# Altium PCB Kame_FMU.PcbDoc (part 1 of 2)
Units mm, origin at the board's own origin, x right, y up, seen from the top; angles counter-clockwise.
Board outline 31 x 31 mm, 6 copper layers (Top, GND2, L3, L4, GND5, Bottom), stack 1.578 mm thick; 102 components, 158 nets, 567 pads, 386 vias.
Unrouted connection lines stored in the file: 87.
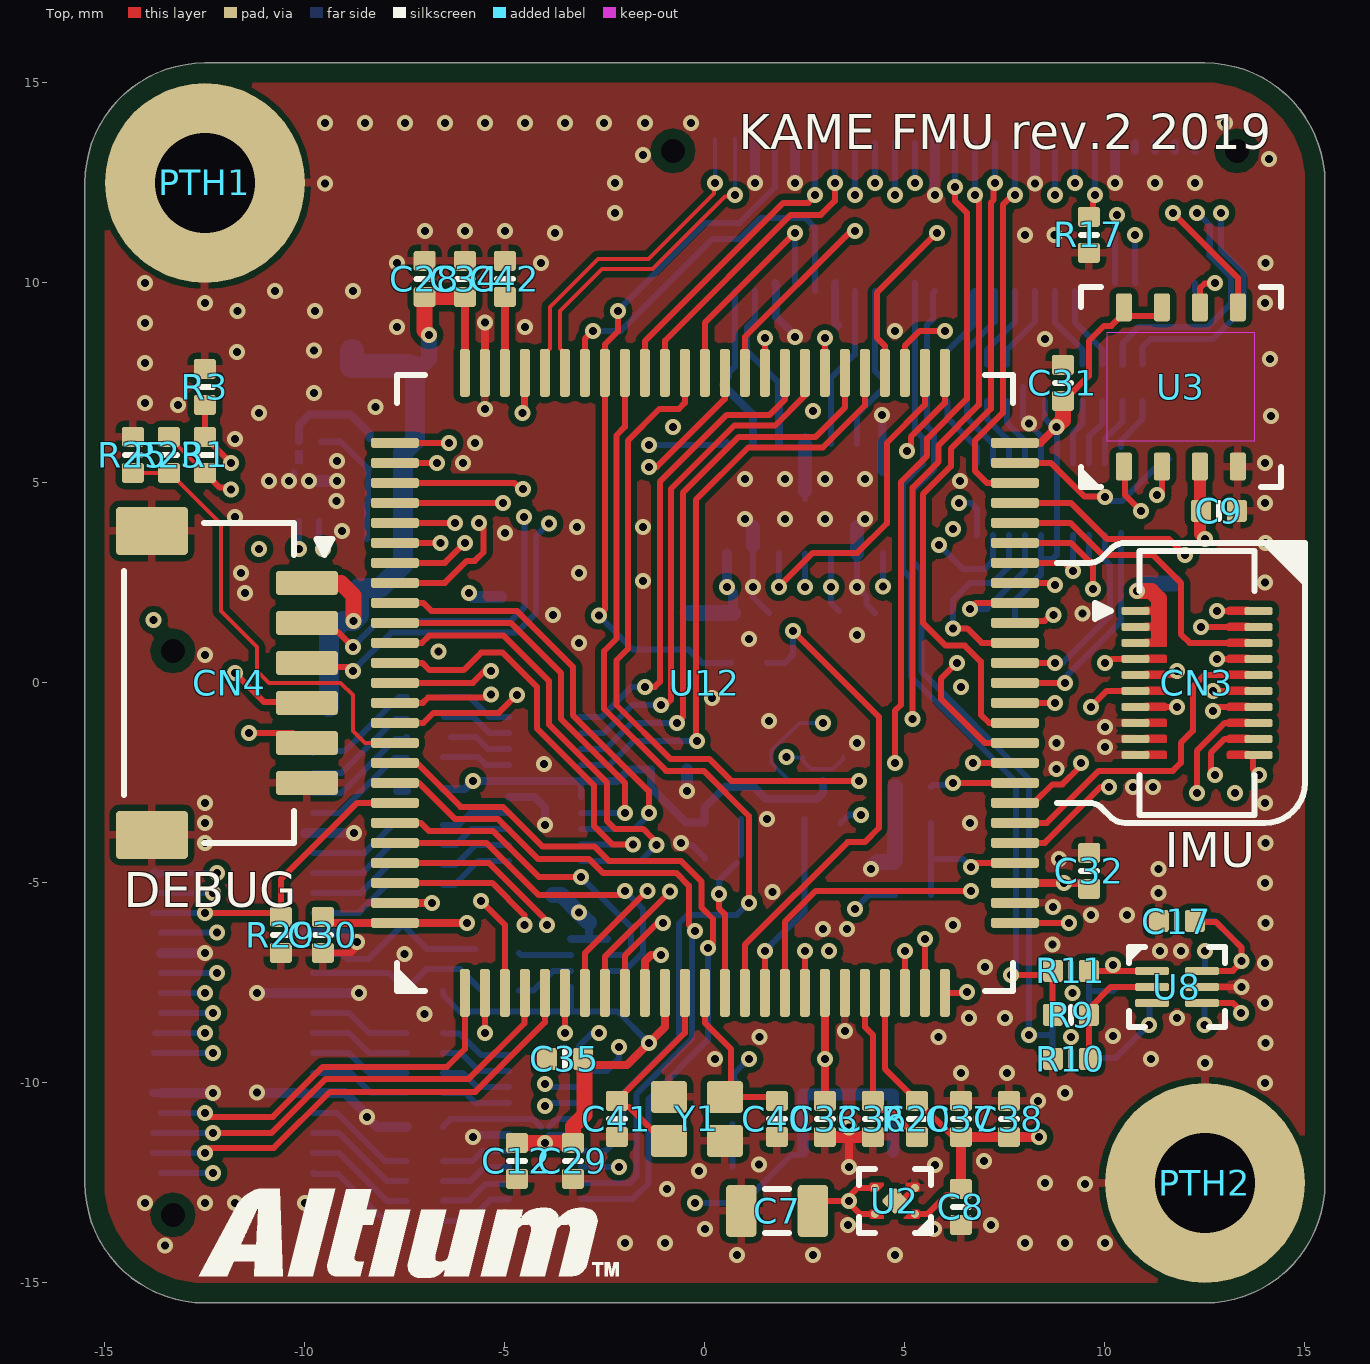
[diagram p0: Top view]
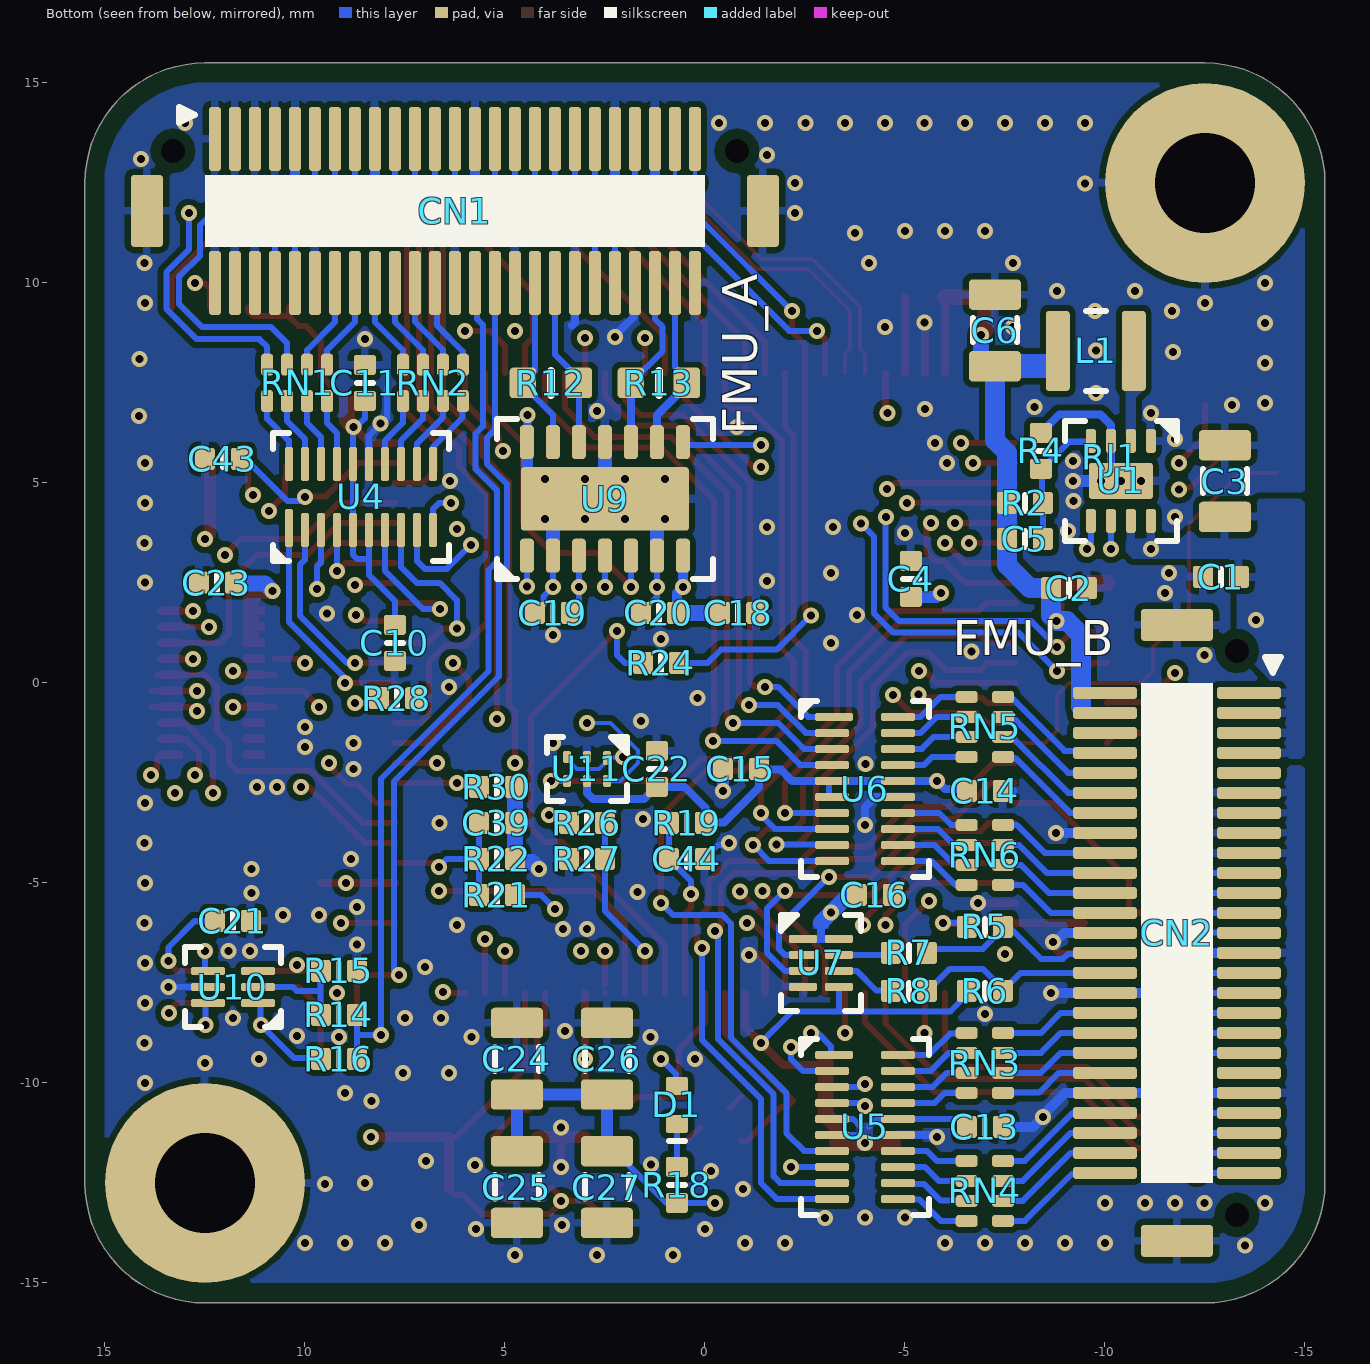
[diagram p1: Bottom view, seen from below]
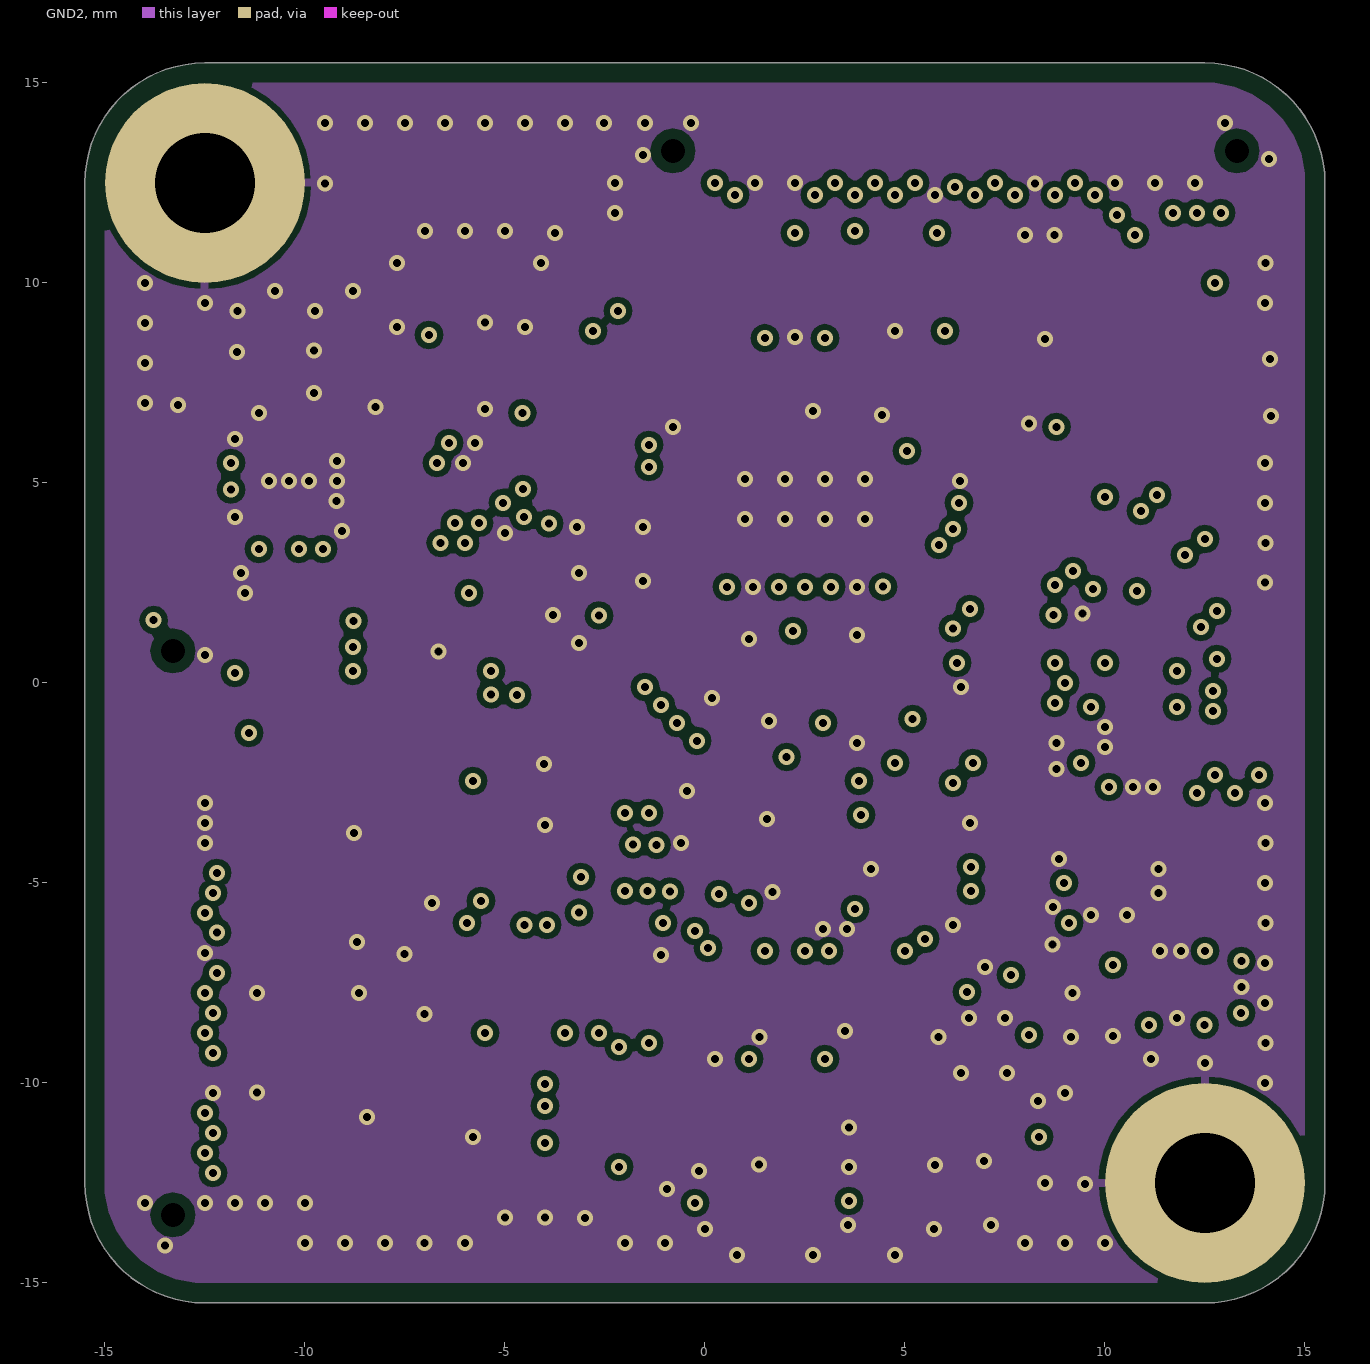
[diagram p2: GND2]
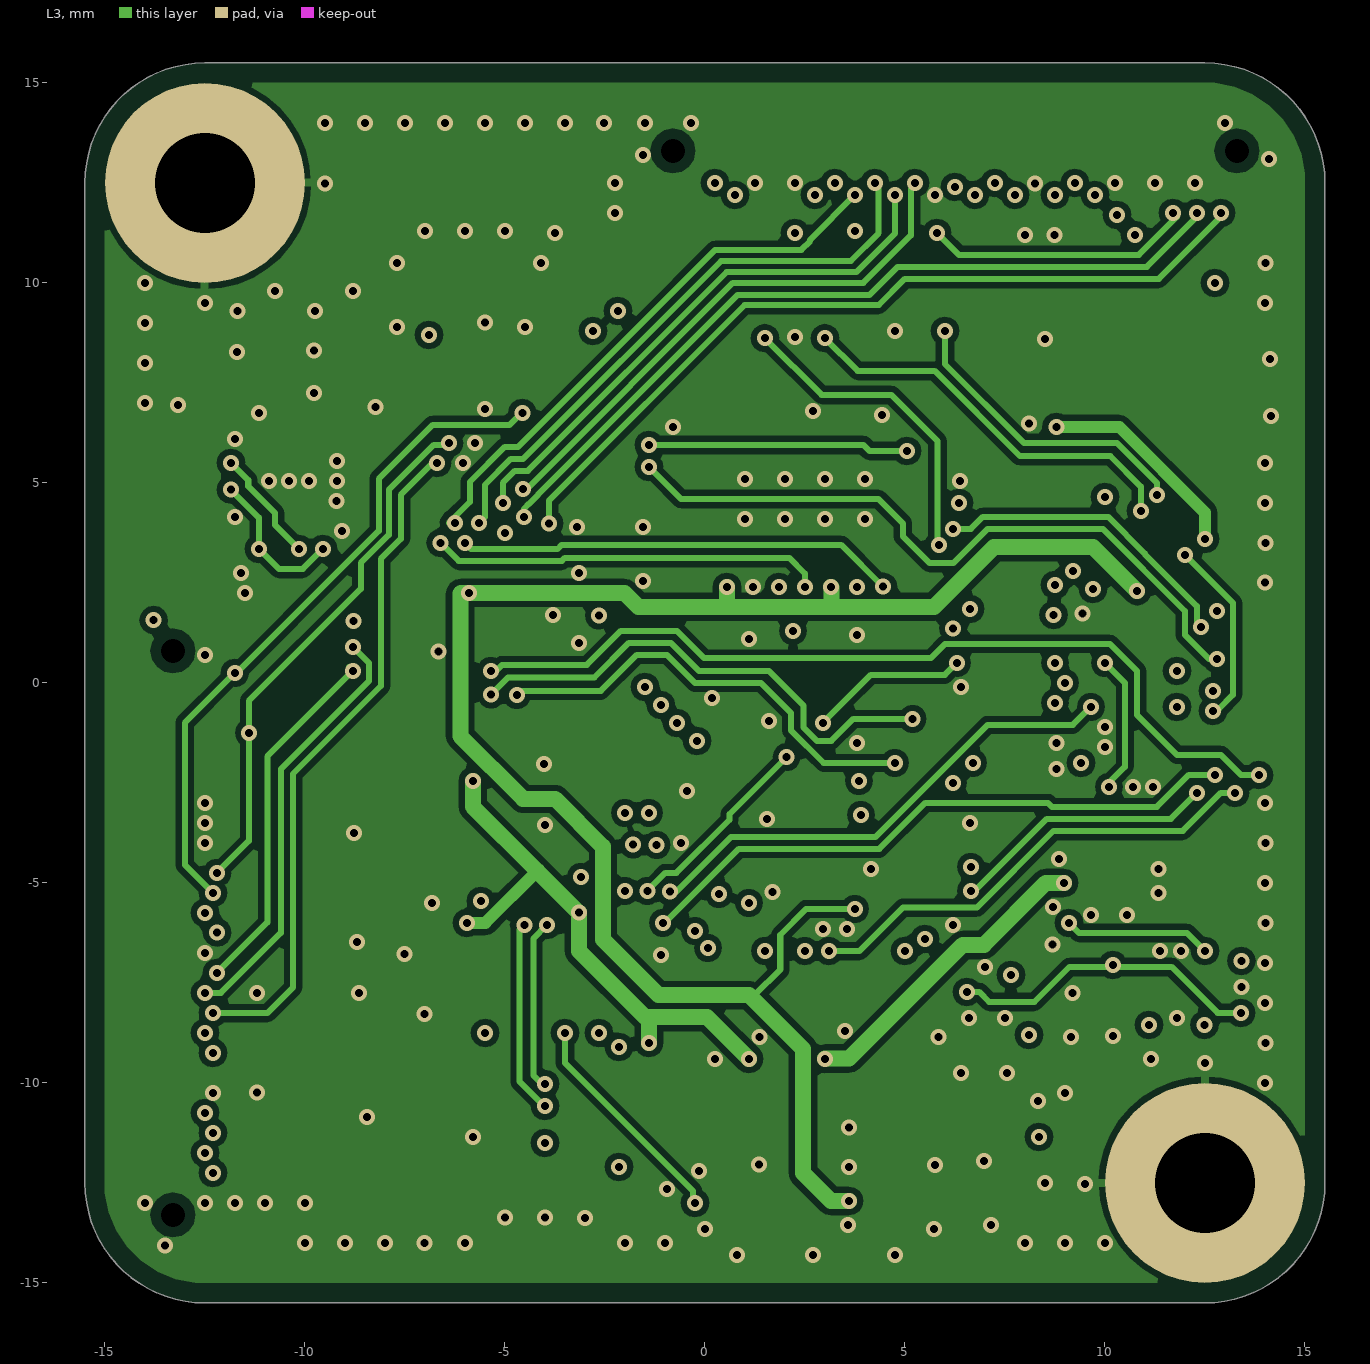
[diagram p3: L3]
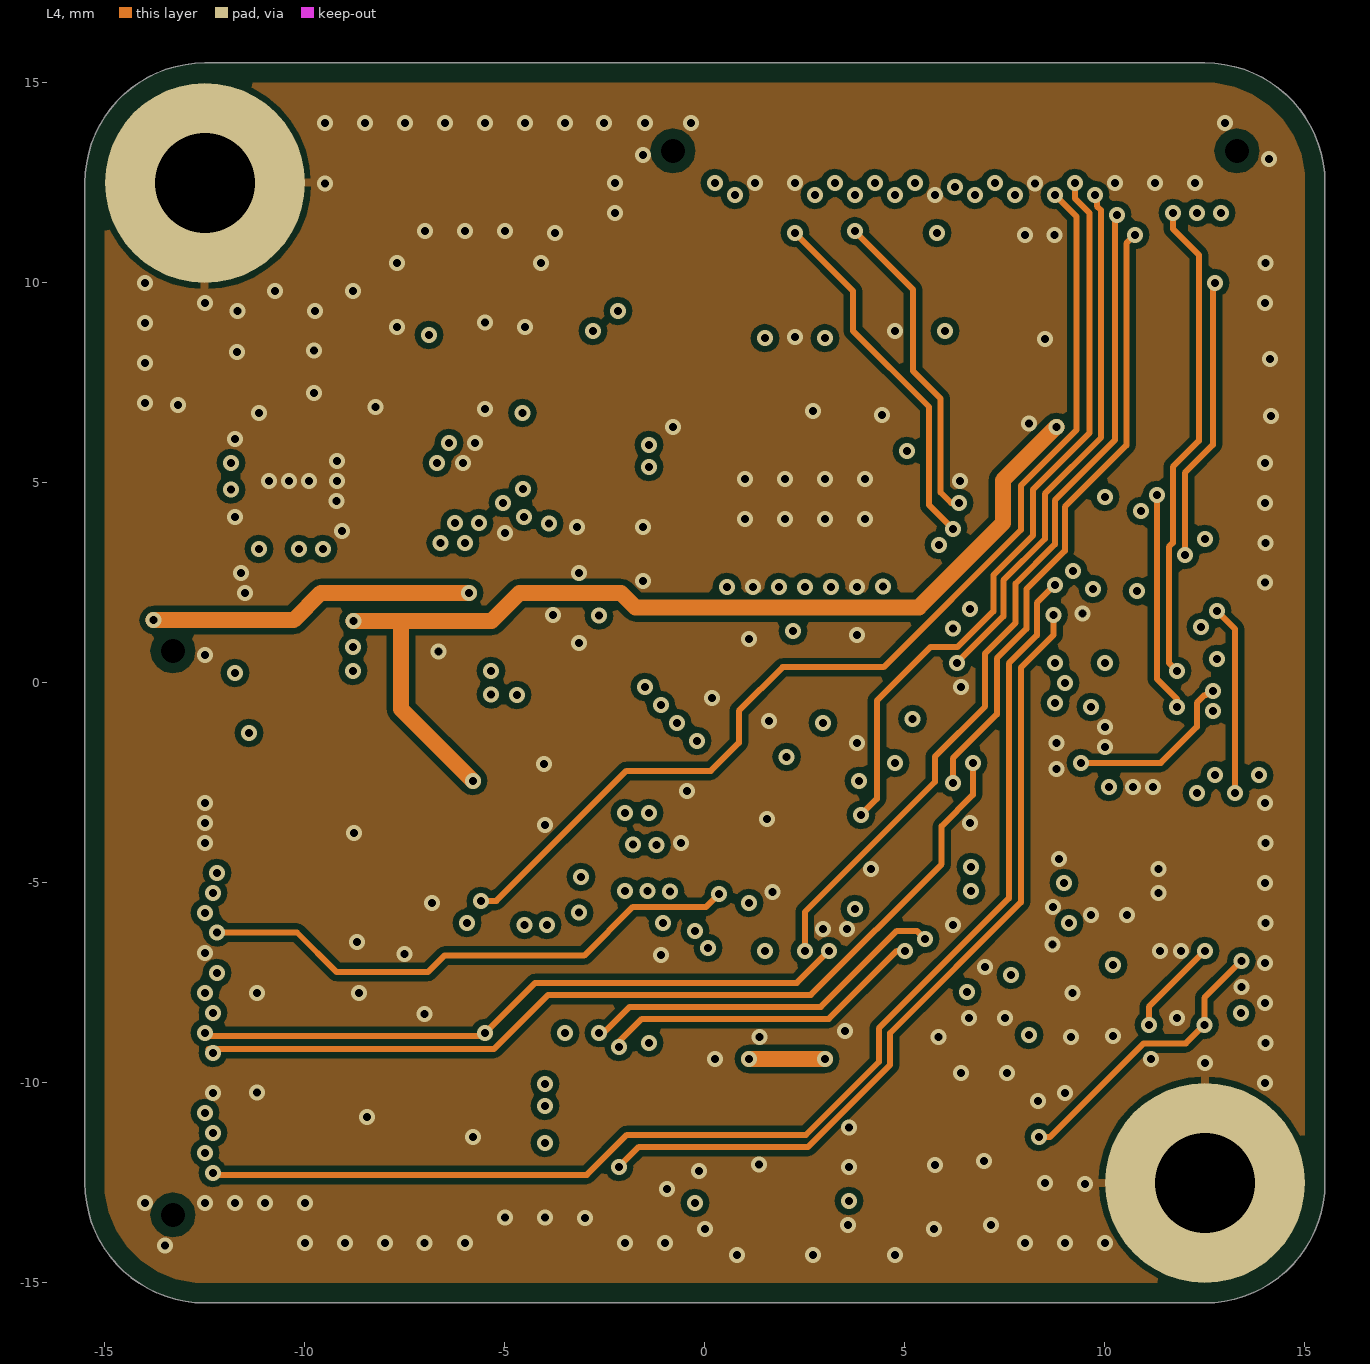
[diagram p4: L4]
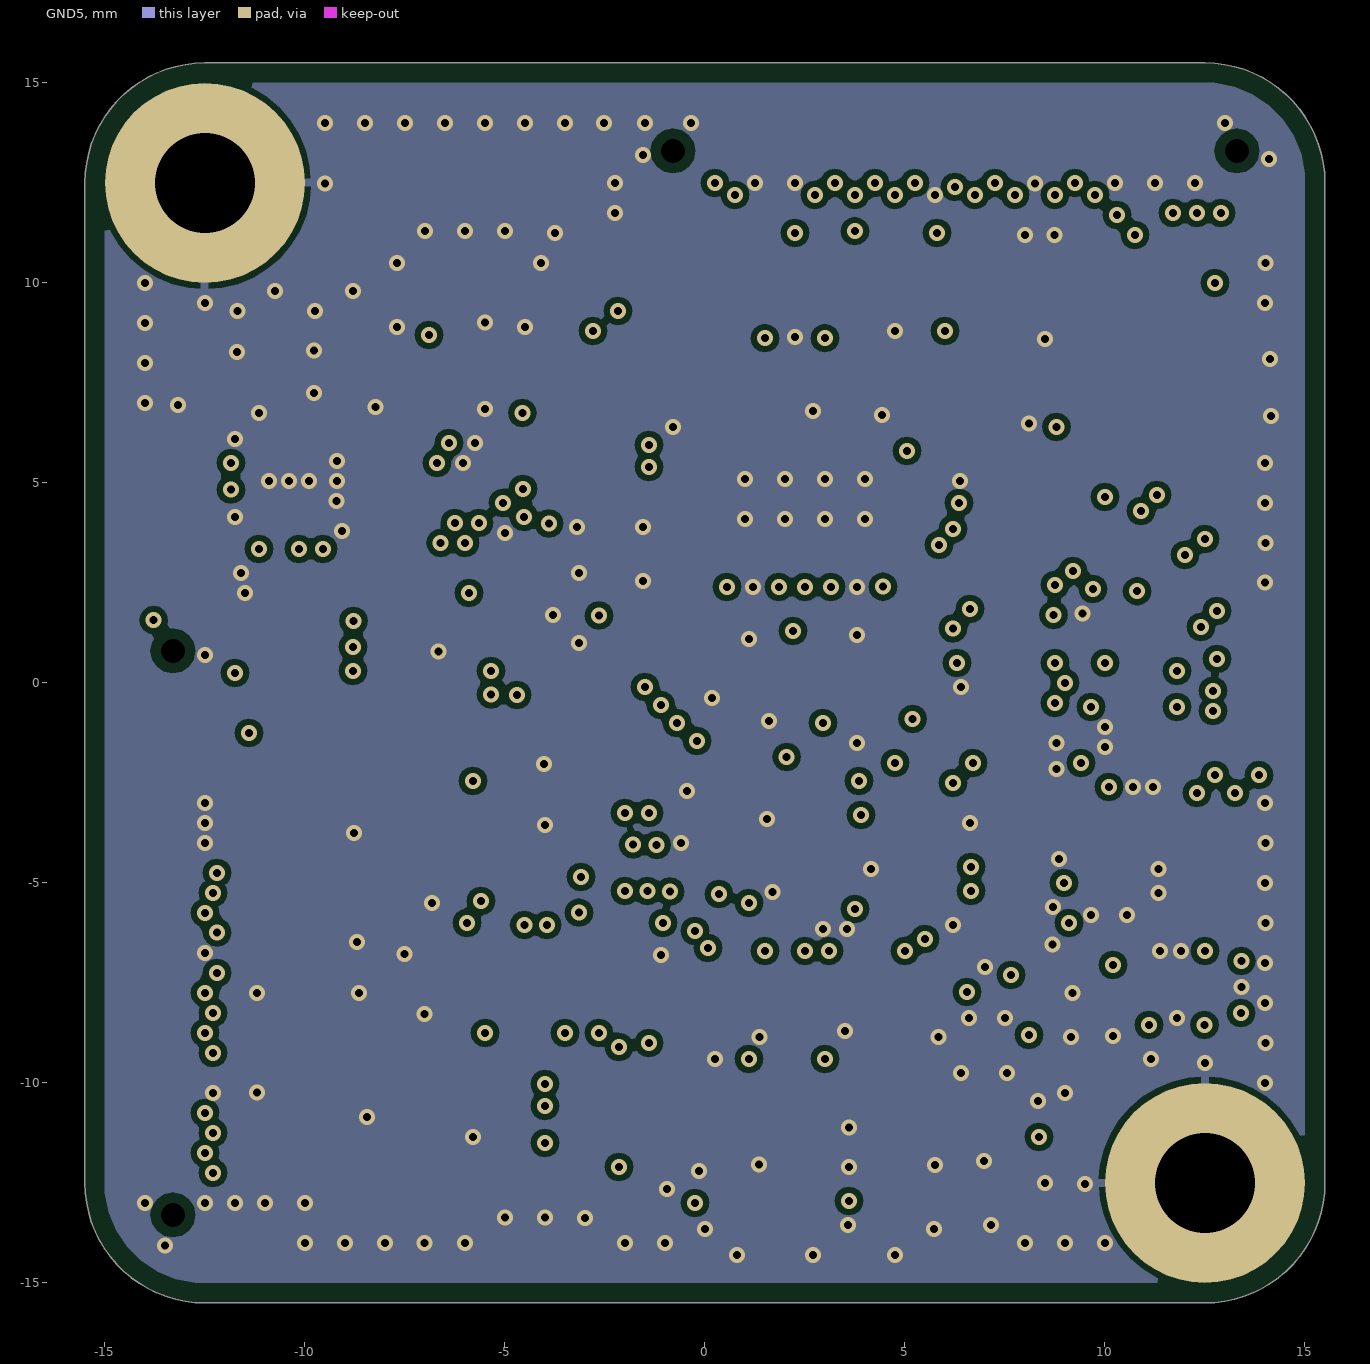
[diagram p5: GND5]
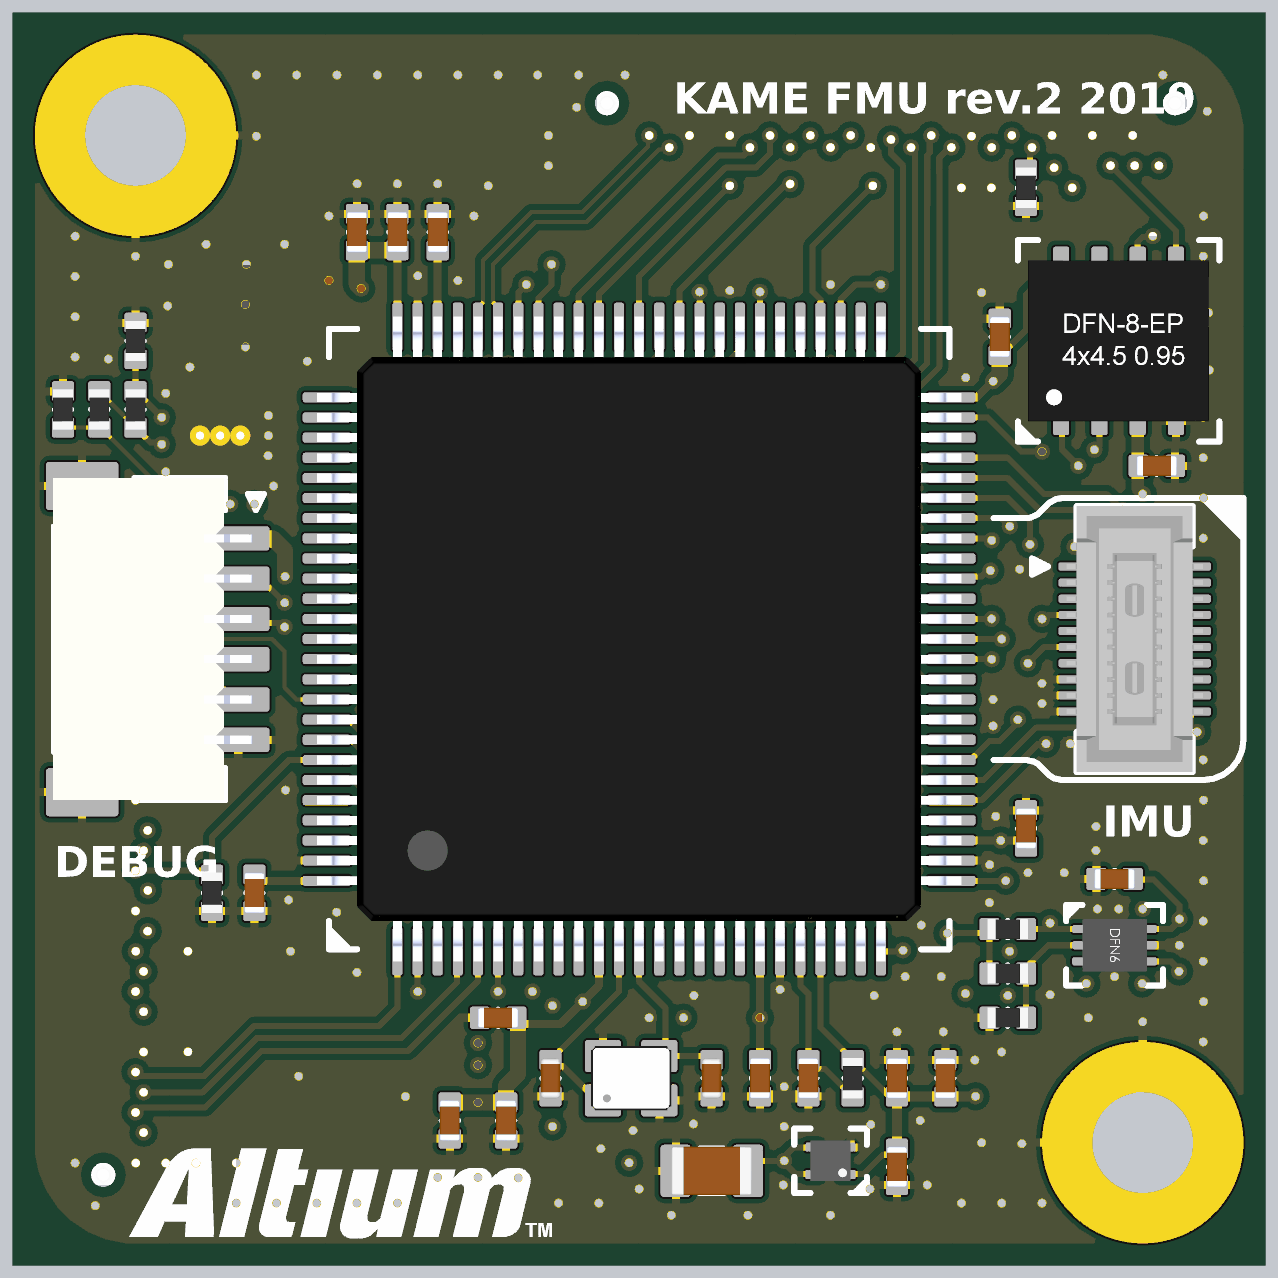
[diagram p7: 3D render of the assembled board from above, using the file's embedded part models]
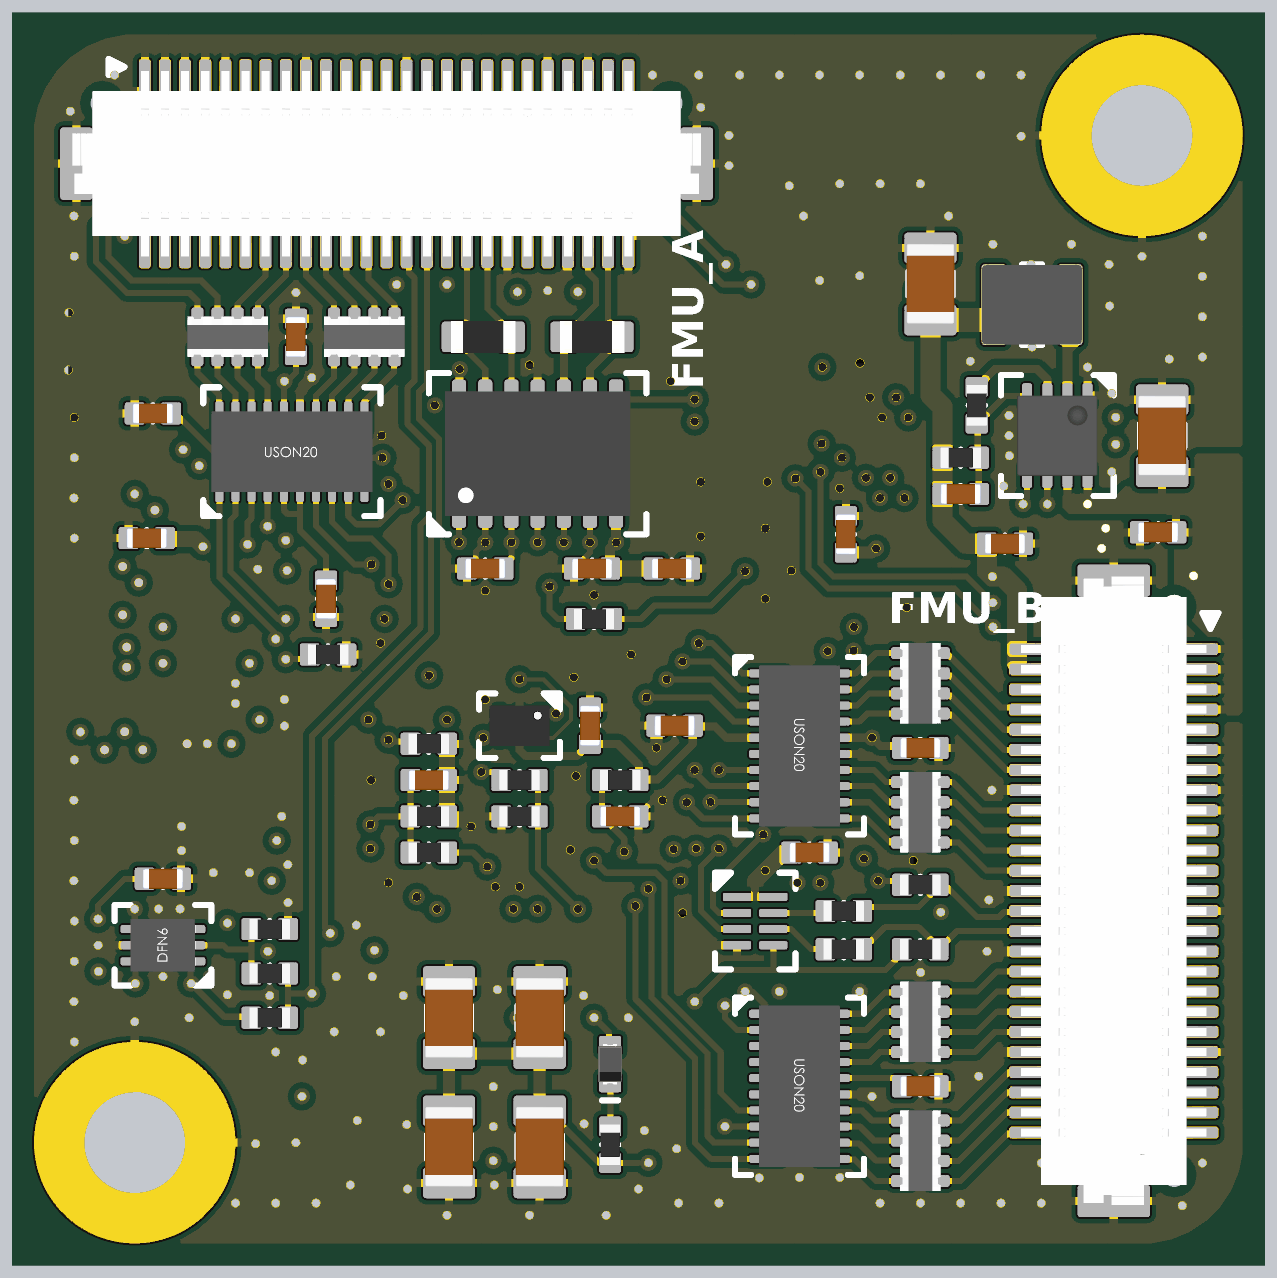
[diagram p8: 3D render of the assembled board from below, using the file's embedded part models]

## Layer stack, top to bottom
Top Solder: solder mask 0.0102, Solder Resist, Dk 3.5
Top: signal copper 0.018
Dielectric 6: prepreg 0.15, PP-006, Dk 4.1
GND2: signal copper 0.018
Dielectric 5: core 0.51, Core-009, Dk 4.5
L3: signal copper 0.018
Dielectric 4: prepreg 0.15, PP-006, Dk 4.1
L4: signal copper 0.018
Dielectric 3: core 0.51, Core-009, Dk 4.5
GND5: signal copper 0.018
Dielectric 2: prepreg 0.15, PP-006, Dk 4.1
Bottom: signal copper 0.018
Bottom Solder: solder mask 0.0102, Solder Resist, Dk 3.5

## Board outline
12.5,-15.5 -12.5,-15.5 cw(c-12.5,-12.5) -15.5,-12.5 -15.5,12.5 cw(c-12.5,12.5) -12.5,15.5 12.5,15.5 cw(c12.5,12.5) 15.5,12.5 15.5,-12.5 cw(c12.5,-12.5)

## Design rules (kind name [scope] priority, off if disabled: settings)
BoardOutlineClearance [All] p1: gap=0.25 ignorepadtopadclearanceinfootprint=FALSE
Clearance "Outline/NPTH clearance" [(IsThruPin and (PadisPlated = 'False')) or IsBoardCutoutRegion or IsBoardOutline] p1: gap=0.25 ignorepadtopadclearanceinfootprint=FALSE
Clearance "Polygon clearance" [InPolygon] p2: gap=0.15 ignorepadtopadclearanceinfootprint=FALSE except(0.2: Arc-Hole Track-Hole SMDPad-Hole THPad-Hole Via-Hole Fill-Hole Poly-Hole Region-Hole Text-Hole)
Clearance "Default clearance" [All] p3: gap=0.1 ignorepadtopadclearanceinfootprint=FALSE
ComponentClearance [All] p1: gap=0.05 collisioncheckmode=3 verticalgap=0.1 showdistances=FALSE
DiffPairsRouting "Schematic Differential Pairs Routing_3" [InNet('USB_N')] p1: maxlimit=0.254 minlimit=0.1 mostfreqgap=0.15 toplayer_minwidth=0.1 toplayer_maxwidth=0.381 toplayer_prefwidth=0.15 midlayer1_minwidth=0.1 midlayer1_maxwidth=0.381 midlayer1_prefwidth=0.15 midlayer2_minwidth=0.1 midlayer2_maxwidth=0.381 midlayer2_prefwidth=0.15 midlayer3_minwidth=0.1 midlayer3_maxwidth=0.381 midlayer3_prefwidth=0.15 midlayer4_minwidth=0.1 midlayer4_maxwidth=0.381 midlayer4_prefwidth=0.15 bottomlayer_minwidth=0.1 bottomlayer_maxwidth=0.381 bottomlayer_prefwidth=0.15 maxuncoupledlength=12.7
DiffPairsRouting "Schematic Differential Pairs Routing_2" [InNet('USB_P')] p2: maxlimit=0.254 minlimit=0.1 mostfreqgap=0.15 toplayer_minwidth=0.1 toplayer_maxwidth=0.381 toplayer_prefwidth=0.1 midlayer1_minwidth=0.1 midlayer1_maxwidth=0.381 midlayer1_prefwidth=0.1 midlayer2_minwidth=0.1 midlayer2_maxwidth=0.381 midlayer2_prefwidth=0.1 midlayer3_minwidth=0.1 midlayer3_maxwidth=0.381 midlayer3_prefwidth=0.1 midlayer4_minwidth=0.1 midlayer4_maxwidth=0.381 midlayer4_prefwidth=0.1 bottomlayer_minwidth=0.1 bottomlayer_maxwidth=0.381 bottomlayer_prefwidth=0.1 maxuncoupledlength=12.7
DiffPairsRouting [InDifferentialPair('OTG_FS')] p3: maxlimit=0.15 minlimit=0.15 mostfreqgap=0.15 toplayer_minwidth=0.1 toplayer_maxwidth=0.1 toplayer_prefwidth=0.1 midlayer1_minwidth=0.1 midlayer1_maxwidth=0.1 midlayer1_prefwidth=0.1 midlayer2_minwidth=0.1 midlayer2_maxwidth=0.1 midlayer2_prefwidth=0.1 midlayer3_minwidth=0.1 midlayer3_maxwidth=0.1 midlayer3_prefwidth=0.1 midlayer4_minwidth=0.1 midlayer4_maxwidth=0.1 midlayer4_prefwidth=0.1 bottomlayer_minwidth=0.1 bottomlayer_maxwidth=0.1 bottomlayer_prefwidth=0.1 maxuncoupledlength=12.7
HoleSize [All] p1: absolutevalues=TRUE maxlimit=6 minlimit=0.2 maxpercent=80.000 minpercent=20.000
MinimumAnnularRing [All] p1: minimumring=0.1
MinimumSolderMaskSliver [All] p1: minsoldermaskwidth=0
PlaneConnect [All] p1: planeconnectstyle=Relief reliefexpansion=0.508 reliefentries=4 reliefconductorwidth=0.15 reliefairgap=0.15
PolygonConnect [IsPolygon vs InNet('GND') And IsVia] p1: connectstyle=Direct reliefconductorwidth=0.15 reliefentries=4 polygonreliefangle="90 Angle" airgapwidth=0.12
PolygonConnect PolygonConnect_1 [All] p2: connectstyle=Relief reliefconductorwidth=0.2 reliefentries=4 polygonreliefangle="90 Angle" airgapwidth=0.15
RoutingCorners [All] p1: cornerstyle=45-Degree minsetback=0.15 maxsetback=0.15
RoutingLayers [All] p1: top layer_v5=TRUE mid layer 1_v5=FALSE mid layer 2_v5=TRUE mid layer 3_v5=TRUE mid layer 4_v5=FALSE bottom layer_v5=TRUE
RoutingVias [All] p1: holewidth=0.2 width=0.4 viastyle="Through Hole" minholewidth=0.15 minwidth=0.35 maxholewidth=0.711 maxwidth=1.27
SilkToSolderMaskClearance [IsPad] p1: minsilkscreentomaskgap=0.1 clearancetoexposedcopper=TRUE
SolderMaskExpansion [All] p1: expansion=0.05 istentingtop=FALSE
Width [All] p1: maxlimit=1 minlimit=0.1 preferedwidth=0.15
22 further rules are at their usual default settings.

## Classes and differential pairs
component class 6_uart_esc_i2c: C10 C11 C12 C13 C14 C15 RN1 RN2 RN3 RN4 RN5 RN6 U4 U5 U6
component class 8_imu&debug_conn: C23 C46 CN3 CN4
component class 5_spi_memory: C9 U3
component class 2_mb_conn: C1 C2 CN1 CN2 PTH1 PTH2
component class 4_cpu: C24 C25 C26 C27 C28 C29 C30 C31 C32 C33 C34 C35 C36 C37 C38 C39 C40 C41 C42 C43 C44 C45 D1 R18 R19 R20 R21 R22 R23 R24 R25 R26 R27 R28 R29 R30 R31 U12 Y1
component class 3_power: C3 C4 C5 C6 C7 C8 L1 R1 R2 R3 R4 RJ1 U1 U2
component class 7_can_rc_i2c_analog: C16 C17 C18 C19 C20 C21 C22 R5 R6 R7 R8 R9 R10 R11 R12 R13 R14 R15 R16 R17 U7 U8 U9 U10 U11
differential pair USB: +USB_P -USB_N

## Components (designator, comment, footprint, x,y, rotation, side; value= is the part's Value field where it differs from the comment)
C1 "Capacitor 100nF +/-20% 10V 0402" CAPC0402(1005)60_L -12.9,2.65 r180 bottom value=100nF
C2 "Capacitor 100nF +/-20% 10V 0402" CAPC0402(1005)60_L -9.1,2.367 r0 bottom value=100nF
C3 "Capacitor 22µF +/-40% 16V 0805" CAPC0805(2012)145_L -13,5.05 r90 bottom value=22µF
C4 "Capacitor 100nF +/-20% 10V 0402" CAPC0402(1005)60_L -5.15,2.6 r270 bottom value=100nF
C5 "Capacitor 22pF +/-10% 50V 0402" CAPC0402(1005)60_L -8,3.6 r0 bottom value=22pF
C6 "Capacitor 22µF +/-40% 16V 0805" CAPC0805(2012)145_L -7.25,8.818 r90 bottom value=22µF
C7 "Capacitor 22µF +/-40% 16V 0805" CAPC0805(2012)145_L 1.8,-13.2 r180 top value=22µF
C8 "Capacitor 100nF +/-20% 10V 0402" CAPC0402(1005)60_L 6.4,-13.1 r90 top value=100nF
C9 "Capacitor 100nF +/-20% 10V 0402" CAPC0402(1005)60_L 12.85,4.3 r180 top value=100nF
C10 "Capacitor 100nF +/-20% 10V 0402" CAPC0402(1005)60_L 7.75,1 r90 bottom value=100nF
C11 "Capacitor 100nF +/-20% 10V 0402" CAPC0402(1005)60_L 8.5,7.5 r270 bottom value=100nF
C12 "Capacitor 100nF +/-20% 10V 0402" CAPC0402(1005)60_L -4.7,-11.95 r90 top value=100nF
C13 "Capacitor 100nF +/-20% 10V 0402" CAPC0402(1005)60_L -7,-11.1 r0 bottom value=100nF
C14 "Capacitor 100nF +/-20% 10V 0402" CAPC0402(1005)60_L -7,-2.7 r0 bottom value=100nF
C15 "Capacitor 100nF +/-20% 10V 0402" CAPC0402(1005)60_L -0.9,-2.15 r0 bottom value=100nF
C16 "Capacitor 100nF +/-20% 10V 0402" CAPC0402(1005)60_L -4.25,-5.3 r0 bottom value=100nF
C17 "Capacitor 100nF +/-20% 10V 0402" CAPC0402(1005)60_L 11.8,-5.952 r0 top value=100nF
C18 "Capacitor 2,2µF +/-20% 10V 0402" CAPC0402(1005)60_L -0.832,1.75 r0 bottom value=2.2µF
C19 "Capacitor 100nF +/-20% 10V 0402" CAPC0402(1005)60_L 3.8,1.75 r180 bottom value=100nF
C20 "Capacitor 100nF +/-20% 10V 0402" CAPC0402(1005)60_L 1.15,1.75 r180 bottom value=100nF
C21 "Capacitor 100nF +/-20% 10V 0402" CAPC0402(1005)60_L 11.8,-5.95 r0 bottom value=100nF
C22 "Capacitor 100nF +/-20% 10V 0402" CAPC0402(1005)60_L 1.2,-2.15 r270 bottom value=100nF
C23 "Capacitor 100nF +/-20% 10V 0402" CAPC0402(1005)60_L 12.2,2.505 r180 bottom value=100nF
C24 "Capacitor 100µF +/-20% 6.3V 0805" CAPC0805(2012)145_L 4.7,-9.4 r270 bottom value=100µF
C25 "Capacitor 100µF +/-20% 6.3V 0805" CAPC0805(2012)145_L 4.7,-12.6 r90 bottom value=100µF
C26 "Capacitor 100µF +/-20% 6.3V 0805" CAPC0805(2012)145_L 2.45,-9.4 r270 bottom value=100µF
C27 "Capacitor 100µF +/-20% 6.3V 0805" CAPC0805(2012)145_L 2.45,-12.6 r90 bottom value=100µF
C28 "Capacitor 2,2µF +/-20% 10V 0402" CAPC0402(1005)60_L -7.006,10.1 r90 top value=2.2µF
C29 "Capacitor 2,2µF +/-20% 10V 0402" CAPC0402(1005)60_L -3.3,-11.95 r270 top value=2.2µF
C30 "Capacitor 100nF +/-20% 10V 0402" CAPC0402(1005)60_L -9.55,-6.3 r270 top value=100nF
C31 "Capacitor 100nF +/-20% 10V 0402" CAPC0402(1005)60_L 8.95,7.5 r90 top value=100nF
C32 "Capacitor 100nF +/-20% 10V 0402" CAPC0402(1005)60_L 9.605,-4.7 r90 top value=100nF
C33 "Capacitor 100nF +/-20% 10V 0402" CAPC0402(1005)60_L 3,-10.9 r270 top value=100nF
C34 "Capacitor 100nF +/-20% 10V 0402" CAPC0402(1005)60_L -6,10.102 r90 top value=100nF
C35 "Capacitor 100nF +/-20% 10V 0402" CAPC0402(1005)60_L -3.5,-9.4 r180 top value=100nF
C36 "Capacitor 2,2µF +/-20% 10V 0402" CAPC0402(1005)60_L 4.2,-10.9 r90 top value=2.2µF
C37 "Capacitor 100nF +/-20% 10V 0402" CAPC0402(1005)60_L 6.4,-10.9 r90 top value=100nF
C38 "Capacitor 2,2µF +/-20% 10V 0402" CAPC0402(1005)60_L 7.6,-10.9 r270 top value=2.2µF
C39 "Capacitor 100nF +/-20% 10V 0402" CAPC0402(1005)60_L 5.2,-3.5 r0 bottom value=100nF
C40 "Capacitor 12pF +/-10% 50V 0402" CAPC0402(1005)33_L 1.8,-10.9 r270 top value=12pF
C41 "Capacitor 12pF +/-10% 50V 0402" CAPC0402(1005)33_L -2.2,-10.9 r270 top value=12pF
C42 "Capacitor 2,2µF +/-20% 10V 0402" CAPC0402(1005)60_L -5,10.1 r90 top value=2.2µF
C43 "Capacitor 2,2µF +/-20% 10V 0402" CAPC0402(1005)60_L 12.05,5.6 r0 bottom value=2.2µF
C44 "Capacitor 100nF +/-20% 10V 0402" CAPC0402(1005)60_L 0.45,-4.4 r0 bottom value=100nF
CN1 "DF12(3.0)-50DS-0.5V(86)" HIRO-DF12(3.0)-50DS-0.5V_V 6.25,11.8 r180 bottom locked
CN2 "DF12(3.0)-50DS-0.5V(86)" HIRO-DF12(3.0)-50DS-0.5V_V -11.8,-6.25 r270 bottom locked
CN3 "DF40C-20DS-0.4V(51)" HIRO-DF40C-20DS-0.4V(51)_V 12.3,0 r270 top locked
CN4 "SM06B-SRSS-TB" JST-SM06B-SRSS-TB_V -12.4,0 r270 top locked
D1 "1SS400CSFH" ROHM-VMN2-2_V 0.7,-10.55 r90 bottom
L1 "VLS252010HBX-2R2M-1" TDK-VLS252010_V -9.771,8.3 r0 bottom
PTH1 "PTH-M2D5X5" PTH-M2D5X5 -12.5,12.5 r0 top locked
PTH2 "PTH-M2D5X5" PTH-M2D5X5 12.5,-12.5 r0 top locked
R1 "Jumper 0402" RESC0402(1005)_L -12.5,5.7 r90 top value=0
R2 "Resistor 383K +/-1 % 0402 63 mW" RESC0402(1005)_L -8,4.5 r180 bottom value=383k
R3 "Resistor 1K +/-5 % 0402 63 mW" RESC0402(1005)_L -12.5,7.4 r270 top value=1k
R4 "Resistor 84K5 +/-1 % 0402 63 mW" RESC0402(1005)_L -8.4,5.8 r270 bottom value=84.5k
R5 "Resistor 2K2  +/-5 % 0402 63 mW" RESC0402(1005)_L -7,-6.1 r180 bottom value=2.2k
R6 "Resistor 2K2  +/-5 % 0402 63 mW" RESC0402(1005)_L -7,-7.7 r0 bottom value=2.2k
R7 "Resistor 200R +/-5 % 0402 63 mW" RESC0402(1005)_L -5.1,-6.75 r180 bottom value=200
R8 "Resistor 200R +/-5 % 0402 63 mW" RESC0402(1005)_L -5.1,-7.7 r180 bottom value=200
R9 "Resistor 1K +/-5 % 0402 63 mW" RESC0402(1005)_L 9.15,-8.3 r180 top value=1k
R10 "Resistor 1M +/-5 % 0402 63 mW" RESC0402(1005)_L 9.15,-9.4 r0 top value=1M
R11 "Resistor 200R +/-5 % 0402 63 mW" RESC0402(1005)_L 9.15,-7.2 r0 top value=200
R12 "Resistor 120R +/-5 % 0603 0.1 W" RESC0603(1608)_L 3.85,7.5 r0 bottom value=120
R13 "Resistor 120R +/-5 % 0603 0.1 W" RESC0603(1608)_L 1.15,7.5 r0 bottom value=120
R14 "Resistor 1K +/-5 % 0402 63 mW" RESC0402(1005)_L 9.15,-8.3 r180 bottom value=1k
R15 "Resistor 1M +/-5 % 0402 63 mW" RESC0402(1005)_L 9.15,-7.2 r0 bottom value=1M
R16 "Resistor 200R +/-5 % 0402 63 mW" RESC0402(1005)_L 9.15,-9.4 r0 bottom value=200
R17 "Resistor 1M +/-5 % 0402 63 mW" RESC0402(1005)_L 9.6,11.2 r270 top value=1M
R18 "Resistor 1K +/-5 % 0402 63 mW" RESC0402(1005)_L 0.7,-12.55 r90 bottom value=1k
R19 "Resistor 10K  +/-1 % 0402 63 mW" RESC0402(1005)_L 0.45,-3.5 r180 bottom value=10k
R20 "Resistor 100R +/-1 % 0402 63 mW" RESC0402(1005)_L 5.3,-10.9 r270 top value=100
R21 "Resistor 10K  +/-1 % 0402 63 mW" RESC0402(1005)_L 5.2,-5.3 r180 bottom value=10k
R22 "Resistor 10K  +/-1 % 0402 63 mW" RESC0402(1005)_L 5.2,-4.4 r0 bottom value=10k
R23 "Resistor 4K7  +/-1 % 0402 63 mW" RESC0402(1005)_L -13.4,5.7 r90 top value=4.7k
R24 "Resistor 10K  +/-1 % 0402 63 mW" RESC0402(1005)_L 1.1,0.5 r0 bottom value=10k
R25 "Resistor 4K7  +/-1 % 0402 63 mW" RESC0402(1005)_L -14.3,5.7 r270 top value=4.7k
R26 "Resistor 10K  +/-1 % 0402 63 mW" RESC0402(1005)_L 2.95,-3.5 r0 bottom value=10k
R27 "Resistor 1M +/-5 % 0402 63 mW" RESC0402(1005)_L 2.95,-4.4 r180 bottom value=1M
R28 "Resistor 10K  +/-1 % 0402 63 mW" RESC0402(1005)_L 7.7,-0.383 r0 bottom value=10k
R29 "Resistor 10K  +/-1 % 0402 63 mW" RESC0402(1005)_L -10.6,-6.3 r90 top value=10k
R30 "Resistor 4K7  +/-1 % 0402 63 mW" RESC0402(1005)_L 5.2,-2.6 r180 bottom value=4.7k
RJ1 "Net Tie 10x8mil" "New footprint 1" -10.152,5.645 r270 bottom net-tie
RN1 "Resistor 200R +/-5% 0402 62.5 mW" Panasonic_EXB28 10.195,7.5 r90 bottom locked value=200
RN2 "Resistor 200R +/-5% 0402 62.5 mW" Panasonic_EXB28 6.8,7.5 r90 bottom locked value=200
RN3 "Resistor 200R +/-5% 0402 62.5 mW" Panasonic_EXB28 -7,-9.5 r180 bottom value=200
RN4 "Resistor 200R +/-5% 0402 62.5 mW" Panasonic_EXB28 -7,-12.7 r180 bottom value=200
RN5 "Resistor 200R +/-5% 0402 62.5 mW" Panasonic_EXB28 -7,-1.1 r180 bottom value=200
RN6 "Resistor 200R +/-5% 0402 62.5 mW" Panasonic_EXB28 -7,-4.3 r180 bottom value=200
U1 "TPS62060DSG" DSG0008A_V -10.4,5.05 r270 bottom
U2 "LP5907SNX-3.3" TI-DQN4-480X480TP_V 4.75,-12.95 r180 top
U3 "FM25V02A-DGTR" SON95P400X75_HS-9N 11.9,7.4 r90 top
U4 "TXB0108DQSR" DQS0020A_V 8.6,4.65 r90 bottom
U5 "TXB0108DQSR" DQS0020A_V -4,-11.1 r180 bottom
U6 "TXB0108DQSR" DQS0020A_V -4,-2.65 r180 bottom
U7 "TXS0102DQMR" DQM -2.9,-7 r180 bottom
U8 "TSV991AIQ1T" STM-DFN-8_V 11.8,-7.6 r0 top
U9 "TJA1046" NXP-SOT1086-2_L 2.5,4.6 r90 bottom locked
U10 "TSV991AIQ1T" STM-DFN-8_V 11.8,-7.6 r0 bottom
U11 "SN74LVC1G58DRYR" DRY0006A_V 2.95,-2.15 r270 bottom
U12 "STM32F427VIT6" STM-LQFP100 0,0 r90 top locked
Y1 "FA-12824.0000MF10Z-W3" EPSON-FA-128_V -0.2,-10.9 r90 top

## Footprints (in the part's own frame and the unit in brackets; to place one, negate y for a bottom-side part, rotate by r counter-clockwise, add the part's x,y. Pads: shape width x height; smd on the part's side, far side on the other; paste and mask are expansions set on the pad)
CAPC0402(1005)33_L [mm] "Chip Capacitor, Body 1.0x0.5mm, Height 0.33mm, IPC High Density"
  rrect25% 0.5x0.55 smd: 1(-0.45,0) 2(0.45,0)
  silkscreen extent 0,-0.2 0,0.2, body extent -0.5,-0.25 0.5,0.25, height 0.55
CAPC0402(1005)60_L [mm] "Chip Capacitor, Body 1.0x0.5mm, Height 0.6mm, IPC High Density"
  rrect25% 0.5x0.55 smd: 1(-0.45,0) 2(0.45,0)
  silkscreen extent 0,-0.2 0,0.2, body extent -0.5,-0.25 0.5,0.25, height 0.6
CAPC0805(2012)145_L [mm] "Chip Capacitor, Body 2.0x1.2mm, Height 1.45mm, IPC High Density"
  rrect25% 0.76x1.3 smd: 1(-0.9,0) 2(0.89,0)
  silkscreen extent -0.3,-0.55 0.3,0.55, body extent -1,-0.6 1,0.6, height 1.45
DQM [mm] "R-PX2SON-N8"
  rrect36% 0.7x0.2 smd paste+0 mask+0.05: 1(-0.45,0.6) 2(-0.45,0.2) 3(-0.45,-0.2) 4(-0.45,-0.6) 5(0.45,-0.6) 6(0.45,-0.2) 7(0.45,0.2) 8(0.45,0.6)
  silkscreen extent -1,-1.2 1,1.2, body extent -0.63,-0.92 0.63,0.92, height 0.35
DQS0020A_V [mm] "SON, 20-Leads, Body 4x2mm, Pitch 0.4mm"
  rrect50% 0.95x0.2 smd: 1(-0.775,1.8)
  rrect50% 0.85x0.2 smd: 2(-0.825,1.4) 3(-0.825,1) 4(-0.825,0.6) 5(-0.825,0.2) 6(-0.825,-0.2) 7(-0.825,-0.6) 8(-0.825,-1) 9(-0.825,-1.4) 10(-0.825,-1.8) 11(0.825,-1.8) 12(0.825,-1.4) 13(0.825,-1) 14(0.825,-0.6) 15(0.825,-0.2) 16(0.825,0.2) 17(0.825,0.6) 18(0.825,1) 19(0.825,1.4) 20(0.825,1.8)
  silkscreen extent -1.6,-2.2 1.6,2.2, body extent -1,-2 1,2, height 0.5
DRY0006A_V [mm] "SON, 6-Leads, Body 1.45x1mm, Pitch 0.5mm"
  rrect50% 0.35x0.2 smd: 1(-0.275,0.5)
  rrect50% 0.3x0.2 smd: 2(-0.3,0) 3(-0.3,-0.5) 4(0.3,-0.5) 5(0.3,0) 6(0.3,0.5)
  silkscreen extent -0.8,-1 0.8,1, body extent -0.5,-0.75 0.5,0.75, height 0.51
DSG0008A_V [mm] "SON, 8-Leads, Body 2x2mm, Pitch 0.5mm, Thermal Pad 1.6x0.9mm, TI Recommended"
  rrect50% 0.6x0.25 smd: 1(-1,0.75) 2(-1,0.25) 3(-1,-0.25) 4(-1,-0.75) 5(1,-0.75) 6(1,-0.25) 7(1,0.25) 8(1,0.75)
  rrect15% 0.9x1.6 smd paste-0.45: 9(0,0)
  silkscreen extent -1.5,-1.4 1.5,1.4, body extent -1,-1 1,1, height 0.79
EPSON-FA-128_V [mm] "SMD, 4-Leads, Body 2x1.6mm, Pitch 1.45mm"
  rrect20% 0.8x0.9 smd: 1(-0.55,0.7) 2(-0.55,-0.7) 3(0.55,-0.7) 4(0.55,0.7)
  body extent -0.8,-1 0.8,1, height 0.4
HIRO-DF12(3.0)-50DS-0.5V_V [mm] "SMD, 50-Leads, Body 14.6x3.6mm, Pitch 0.5mm"
  rrect50% 0.3x1.6 smd paste-0.01: 1(-6,1.8) 2(-6,-1.8) 3(-5.5,1.8) 4(-5.5,-1.8) 5(-5,1.8) 6(-5,-1.8) 7(-4.5,1.8) 8(-4.5,-1.8) 9(-4,1.8) 10(-4,-1.8) 11(-3.5,1.8) 12(-3.5,-1.8) 13(-3,1.8) 14(-3,-1.8) 15(-2.5,1.8) 16(-2.5,-1.8) 17(-2,1.8) 18(-2,-1.8) 19(-1.5,1.8) 20(-1.5,-1.8) 21(-1,1.8) 22(-1,-1.8) 23(-0.5,1.8) 24(-0.5,-1.8) 25(0,1.8) 26(0,-1.8) 27(0.5,1.8) 28(0.5,-1.8) 29(1,1.8) 30(1,-1.8) 31(1.5,1.8) 32(1.5,-1.8) 33(2,1.8) 34(2,-1.8) 35(2.5,1.8) 36(2.5,-1.8) 37(3,1.8) 38(3,-1.8) 39(3.5,1.8) 40(3.5,-1.8) 41(4,1.8) 42(4,-1.8) 43(4.5,1.8) 44(4.5,-1.8) 45(5,1.8) 46(5,-1.8) 47(5.5,1.8) 48(5.5,-1.8) 49(6,1.8) 50(6,-1.8)
  round 0 hole 0.6 unplated: H1(-7.05,1.5) H2(7.05,1.5)
  rrect20% 0.8x1.8 smd: MP1(-7.7,0) MP2(7.7,0)
  silkscreen extent -6.9,2.2 -6.5,2.6, body extent -7.8,-2.3 7.8,2.3, height 2.2
HIRO-DF40C-20DS-0.4V(51)_V [mm] "CONN, 20-Lead, Body 6.6x2.88mm, Pitch 0.4mm"
  rrect50% 0.2x0.7 smd: 1(-1.8,-1.54) 2(-1.8,1.54) 3(-1.4,-1.54) 4(-1.4,1.54) 5(-1,-1.54) 6(-1,1.54) 7(-0.6,-1.54) 8(-0.6,1.54) 9(-0.2,-1.54) 10(-0.2,1.54) 11(0.2,-1.54) 12(0.2,1.54) 13(0.6,-1.54) 14(0.6,1.54) 15(1,-1.54) 16(1,1.54) 17(1.4,-1.54) 18(1.4,1.54) 19(1.8,-1.54) 20(1.8,1.54)
  Top region: 1.9,1.3 1.7,1.3 1.7,0.8 1.7,0.79 1.708,0.772 1.722,0.758 1.74,0.75 1.75,0.75 1.75,0.75 1.85,0.75 1.86,0.75 1.878,0.758 1.892,0.772 1.9,0.79 1.9,0.8 1.9,0.8
  Top region: 1.5,1.3 1.3,1.3 1.3,0.8 1.3,0.79 1.308,0.772 1.322,0.758 1.34,0.75 1.35,0.75 1.35,0.75 1.45,0.75 1.46,0.75 1.478,0.758 1.492,0.772 1.5,0.79 1.5,0.8 1.5,0.8
  Top region: 1.1,1.3 0.9,1.3 0.9,0.8 0.9,0.79 0.908,0.772 0.922,0.758 0.94,0.75 0.95,0.75 0.95,0.75 1.05,0.75 1.06,0.75 1.078,0.758 1.092,0.772 1.1,0.79 1.1,0.8 1.1,0.8
  Top region: 0.7,1.3 0.5,1.3 0.5,0.8 0.5,0.79 0.508,0.772 0.522,0.758 0.54,0.75 0.55,0.75 0.55,0.75 0.65,0.75 0.66,0.75 0.678,0.758 0.692,0.772 0.7,0.79 0.7,0.8 0.7,0.8
  Top region: 0.3,1.3 0.1,1.3 0.1,0.8 0.1,0.79 0.108,0.772 0.122,0.758 0.14,0.75 0.15,0.75 0.15,0.75 0.25,0.75 0.26,0.75 0.278,0.758 0.292,0.772 0.3,0.79 0.3,0.8 0.3,0.8
  Top region: -0.1,1.3 -0.3,1.3 -0.3,0.8 -0.3,0.79 -0.292,0.772 -0.278,0.758 -0.26,0.75 -0.25,0.75 -0.25,0.75 -0.15,0.75 -0.14,0.75 -0.122,0.758 -0.108,0.772 -0.1,0.79 -0.1,0.8 -0.1,0.8
  Top region: -0.5,1.3 -0.7,1.3 -0.7,0.8 -0.7,0.79 -0.692,0.772 -0.678,0.758 -0.66,0.75 -0.65,0.75 -0.65,0.75 -0.55,0.75 -0.54,0.75 -0.522,0.758 -0.508,0.772 -0.5,0.79 -0.5,0.8 -0.5,0.8
  Top region: -0.9,1.3 -1.1,1.3 -1.1,0.8 -1.1,0.79 -1.092,0.772 -1.078,0.758 -1.06,0.75 -1.05,0.75 -1.05,0.75 -0.95,0.75 -0.94,0.75 -0.922,0.758 -0.908,0.772 -0.9,0.79 -0.9,0.8 -0.9,0.8
  Top region: -1.3,1.3 -1.5,1.3 -1.5,0.8 -1.5,0.79 -1.492,0.772 -1.478,0.758 -1.46,0.75 -1.45,0.75 -1.45,0.75 -1.35,0.75 -1.34,0.75 -1.322,0.758 -1.308,0.772 -1.3,0.79 -1.3,0.8 -1.3,0.8
  Top region: -1.7,1.3 -1.9,1.3 -1.9,0.8 -1.9,0.79 -1.892,0.772 -1.878,0.758 -1.86,0.75 -1.85,0.75 -1.85,0.75 -1.75,0.75 -1.74,0.75 -1.722,0.758 -1.708,0.772 -1.7,0.79 -1.7,0.8 -1.7,0.8
  Top region: 1.7,-1.3 1.9,-1.3 1.9,-0.8 1.9,-0.79 1.892,-0.772 1.878,-0.758 1.86,-0.75 1.85,-0.75 1.85,-0.75 1.75,-0.75 1.74,-0.75 1.722,-0.758 1.708,-0.772 1.7,-0.79 1.7,-0.8 1.7,-0.8
  Top region: 1.3,-1.3 1.5,-1.3 1.5,-0.8 1.5,-0.79 1.492,-0.772 1.478,-0.758 1.46,-0.75 1.45,-0.75 1.45,-0.75 1.35,-0.75 1.34,-0.75 1.322,-0.758 1.308,-0.772 1.3,-0.79 1.3,-0.8 1.3,-0.8
  Top region: 0.9,-1.3 1.1,-1.3 1.1,-0.8 1.1,-0.79 1.092,-0.772 1.078,-0.758 1.06,-0.75 1.05,-0.75 1.05,-0.75 0.95,-0.75 0.94,-0.75 0.922,-0.758 0.908,-0.772 0.9,-0.79 0.9,-0.8 0.9,-0.8
  Top region: 0.5,-1.3 0.7,-1.3 0.7,-0.8 0.7,-0.79 0.692,-0.772 0.678,-0.758 0.66,-0.75 0.65,-0.75 0.65,-0.75 0.55,-0.75 0.54,-0.75 0.522,-0.758 0.508,-0.772 0.5,-0.79 0.5,-0.8 0.5,-0.8
  Top region: 0.1,-1.3 0.3,-1.3 0.3,-0.8 0.3,-0.79 0.292,-0.772 0.278,-0.758 0.26,-0.75 0.25,-0.75 0.25,-0.75 0.15,-0.75 0.14,-0.75 0.122,-0.758 0.108,-0.772 0.1,-0.79 0.1,-0.8 0.1,-0.8
  Top region: -0.3,-1.3 -0.1,-1.3 -0.1,-0.8 -0.1,-0.79 -0.108,-0.772 -0.122,-0.758 -0.14,-0.75 -0.15,-0.75 -0.15,-0.75 -0.25,-0.75 -0.26,-0.75 -0.278,-0.758 -0.292,-0.772 -0.3,-0.79 -0.3,-0.8 -0.3,-0.8
  Top region: -0.7,-1.3 -0.5,-1.3 -0.5,-0.8 -0.5,-0.79 -0.508,-0.772 -0.522,-0.758 -0.54,-0.75 -0.55,-0.75 -0.55,-0.75 -0.65,-0.75 -0.66,-0.75 -0.678,-0.758 -0.692,-0.772 -0.7,-0.79 -0.7,-0.8 -0.7,-0.8
  Top region: -1.1,-1.3 -0.9,-1.3 -0.9,-0.8 -0.9,-0.79 -0.908,-0.772 -0.922,-0.758 -0.94,-0.75 -0.95,-0.75 -0.95,-0.75 -1.05,-0.75 -1.06,-0.75 -1.078,-0.758 -1.092,-0.772 -1.1,-0.79 -1.1,-0.8 -1.1,-0.8
  Top region: -1.5,-1.3 -1.3,-1.3 -1.3,-0.8 -1.3,-0.79 -1.308,-0.772 -1.322,-0.758 -1.34,-0.75 -1.35,-0.75 -1.35,-0.75 -1.45,-0.75 -1.46,-0.75 -1.478,-0.758 -1.492,-0.772 -1.5,-0.79 -1.5,-0.8 -1.5,-0.8
  Top region: -1.9,-1.3 -1.7,-1.3 -1.7,-0.8 -1.7,-0.79 -1.708,-0.772 -1.722,-0.758 -1.74,-0.75 -1.75,-0.75 -1.75,-0.75 -1.85,-0.75 -1.86,-0.75 -1.878,-0.758 -1.892,-0.772 -1.9,-0.79 -1.9,-0.8 -1.9,-0.8
  silkscreen extent -3.3,-2.55 3.3,1.44, body extent -3.3,-1.69 3.3,1.69, height 1.45
JST-SM06B-SRSS-TB_V [mm] "SMD, 6-Leads, Body 8x4.25mm, Pitch 1mm"
  rrect25% 0.6x1.55 smd: 1(-2.5,2.45) 2(-1.5,2.45) 3(-0.5,2.45) 4(0.5,2.45) 5(1.5,2.45) 6(2.5,2.45)
  rrect15% 1.2x1.8 smd: MP1(-3.8,-1.425) MP2(3.8,-1.425)
  silkscreen extent -4,-2.12 4,3.09, body extent -4,-2.15 4,2.8, height 2.9
"New footprint 1" [mil]
  rect 1x8 smd: 1(-6.89,0) 2(6.89,0)
  Top region: -6.89,4 6.89,4 6.89,-4 -6.89,-4
NXP-SOT1086-2_L [mm] "SON, 14-Leads, Body 4.6x3.1mm, Pitch 0.65mm, Thermal Pad 4.2x1.59mm, IPC High Density"
  rrect50% 0.85x0.35 smd: 1(-1.42,1.95) 2(-1.42,1.3) 3(-1.42,0.65) 4(-1.42,0) 5(-1.42,-0.65) 6(-1.42,-1.3) 7(-1.42,-1.95) 8(1.42,-1.95) 9(1.42,-1.3) 10(1.42,-0.65) 11(1.42,0) 12(1.42,0.65) 13(1.42,1.3) 14(1.42,1.95)
  rrect10% 1.59x4.2 smd: 15(0,0)
  silkscreen extent -2,-2.7 2,2.7, body extent -1.55,-2.3 1.55,2.3, height 1
Panasonic_EXB28 [mm] "Resistor network, 0402x4, convex terminal"
  rrect50% 0.55x0.3 smd: 1(-0.455,0.75) 2(-0.455,0.25) 3(-0.455,-0.25) 4(-0.455,-0.75) 5(0.455,-0.75) 6(0.455,-0.25) 7(0.455,0.25) 8(0.455,0.75)
  body extent -0.5,-1 0.5,1, height 0.37
PTH-M2D5X5 [mm]
  round 5 hole 2.5: 1(0,0)
RESC0402(1005)_L [mm] "Chip Resistor, Body 1.0x0.5mm, IPC High Density"
  rrect25% 0.5x0.55 smd: 1(-0.45,0) 2(0.45,0)
  silkscreen extent 0,-0.2 0,0.2, body extent -0.5,-0.25 0.5,0.25, height 0.3
RESC0603(1608)_L [mm] "Chip Resistor, Body 1.6x0.8mm, IPC High Density"
  rrect25% 0.66x0.76 smd: 1(-0.7,0) 2(0.7,0)
  silkscreen extent 0,-0.3 0,0.3, body extent -0.8,-0.4 0.8,0.4, height 0.45
ROHM-VMN2-2_V [mm] "VMN2, 2-Leads, Body 0.9x0.6mm, Pitch 0.95mm"
  rrect25% 0.45x0.55 smd: 1(-0.475,0) 2(0.475,0)
  silkscreen extent -0.9,-0.2 -0.9,0.2, body extent -0.5,-0.3 0.5,0.3, height 0.37
SON95P400X75_HS-9N [mm] "SON, 8-Leads, Body 4,50x4,00mm, Pitch 0,95mm, Thermal Pad 2,61x2,88mm, IPC Medium Density"
  rrect30% 0.7x0.4 smd: 1(-1.99,1.425) 2(-1.99,0.475) 3(-1.99,-0.475) 4(-1.99,-1.425) 5(1.99,-1.425) 6(1.99,-0.475) 7(1.99,0.475) 8(1.99,1.425)
  Top keep-out region: -1.35,-1.85 1.35,-1.85 1.35,1.85 -1.35,1.85
  silkscreen extent -2.5,-2.5 2.5,2.5, body extent -2,-2.25 2,2.25, height 0.77
STM-DFN-8_V [mm] "DFN, 8-Leads, Body 2x2mm, Pitch 0.5mm"
  rrect50% 0.85x0.2 smd: 1(-0.625,0.4) 2(-0.625,0) 3(-0.625,-0.4) 4(0.625,-0.4) 5(0.625,0) 6(0.625,0.4)
  silkscreen extent -1.2,-1 1.2,1, body extent -0.81,-0.65 0.81,0.65, height 0.56
STM-LQFP100 [mm]
  rrect50% 1.2x0.25 smd: 1(-7.75,6) 2(-7.75,5.5) 3(-7.75,5) 4(-7.75,4.5) 5(-7.75,4) 6(-7.75,3.5) 7(-7.75,3) 8(-7.75,2.5) 9(-7.75,2) 10(-7.75,1.5) 11(-7.75,1) 12(-7.75,0.5) 13(-7.75,0) 14(-7.75,-0.5) 15(-7.75,-1) 16(-7.75,-1.5) 17(-7.75,-2) 18(-7.75,-2.5) 19(-7.75,-3) 20(-7.75,-3.5) 21(-7.75,-4) 22(-7.75,-4.5) 23(-7.75,-5) 24(-7.75,-5.5) 25(-7.75,-6) 51(7.75,-6) 52(7.75,-5.5) 53(7.75,-5) 54(7.75,-4.5) 55(7.75,-4) 56(7.75,-3.5) 57(7.75,-3) 58(7.75,-2.5) 59(7.75,-2) 60(7.75,-1.5) 61(7.75,-1) 62(7.75,-0.5) 63(7.75,0) 64(7.75,0.5) 65(7.75,1) 66(7.75,1.5) 67(7.75,2) 68(7.75,2.5) 69(7.75,3) 70(7.75,3.5) 71(7.75,4) 72(7.75,4.5) 73(7.75,5) 74(7.75,5.5) 75(7.75,6)
  rrect50% 0.25x1.2 smd: 26(-6,-7.75) 27(-5.5,-7.75) 28(-5,-7.75) 29(-4.5,-7.75) 30(-4,-7.75) 31(-3.5,-7.75) 32(-3,-7.75) 33(-2.5,-7.75) 34(-2,-7.75) 35(-1.5,-7.75) 36(-1,-7.75) 37(-0.5,-7.75) 38(0,-7.75) 39(0.5,-7.75) 40(1,-7.75) 41(1.5,-7.75) 42(2,-7.75) 43(2.5,-7.75) 44(3,-7.75) 45(3.5,-7.75) 46(4,-7.75) 47(4.5,-7.75) 48(5,-7.75) 49(5.5,-7.75) 50(6,-7.75) 76(6,7.75) 77(5.5,7.75) 78(5,7.75) 79(4.5,7.75) 80(4,7.75) 81(3.5,7.75) 82(3,7.75) 83(2.5,7.75) 84(2,7.75) 85(1.5,7.75) 86(1,7.75) 87(0.5,7.75) 88(0,7.75) 89(-0.5,7.75) 90(-1,7.75) 91(-1.5,7.75) 92(-2,7.75) 93(-2.5,7.75) 94(-3,7.75) 95(-3.5,7.75) 96(-4,7.75) 97(-4.5,7.75) 98(-5,7.75) 99(-5.5,7.75) 100(-6,7.75)
  silkscreen extent -7.7,-7.7 7.7,7.7, body extent -8,-8 8,8, height 1.6
TDK-VLS252010_V [mm] "SMD, 2-Leads, Body 2.5x2mm"
  rrect25% 0.6x2 smd: 1(-0.95,0) 2(0.95,0)
  silkscreen extent -0.25,-1 0.25,1, body extent -1.25,-1 1.25,1, height 1
TI-DQN4-480X480TP_V [mm] "SON, 4-Leads, Body 1x1mm, Pitch 0.65mm, Thermal Pad 0.5x0.5mm"
  round 0.2 smd mask+0: 1(-0.5,0.325) 2(-0.5,-0.325) 3(0.5,-0.325) 4(0.5,0.325)
  rrect25% 0.48x0.48 smd rot 45 paste+0.005: 5(0,0)
  Top region: -0.225,0.45 -0.225,0.425 -0.425,0.225 -0.6,0.225 -0.625,0.25 -0.625,0.425 -0.6,0.45
  Top region: 0.275,0.45 0.275,0.375 0.425,0.225 0.6,0.225 0.625,0.25 0.625,0.425 0.6,0.45
  Top region: 0.275,-0.45 0.275,-0.375 0.425,-0.225 0.6,-0.225 0.625,-0.25 0.625,-0.425 0.6,-0.45
  Top region: -0.275,-0.45 -0.275,-0.375 -0.425,-0.225 -0.6,-0.225 -0.625,-0.25 -0.625,-0.425 -0.6,-0.45
  silkscreen extent -0.9,-0.8 0.9,0.8, body extent -0.5,-0.5 0.5,0.5, height 0.35

## Part data
C1 C2 C4 C8 C9 C10 C11 C12 C13 C14 C15 C16 C17 C19 C20 C21 C22 C23 C30 C31 C32 C33 C34 C35 C37 C39 C44: library part CMP-001-00061-2, "Chip Capacitor, 100nF +/-20%, 10V, 0402, Thickness 0.6 mm", Case/Package=0402, Max Operating Temperature=85°C, Min Operating Temperature=-55°C, Tolerance=20%, Voltage Rating=10V, Mounting Technology=SMT, Pins=2
C3 C6 C7: library part CMP-001-00081-2, "Chip Capacitor, 22µF +/-40%, 16V, 0805, Thickness 1.45 mm", Case/Package=0402, Max Operating Temperature=85°C, Min Operating Temperature=-55°C, Tolerance=5%, Voltage Rating=16V, Mounting Technology=SMT, Pins=2
C5: library part CMP-001-00073-2, "Chip Capacitor, 22pF +/-10%, 50V, 0402, Thickness 0.6 mm", Case/Package=0402, Max Operating Temperature=85°C, Min Operating Temperature=-55°C, Tolerance=10%, Voltage Rating=50V, Mounting Technology=SMT, Pins=2
C18 C28 C29 C36 C38 C42 C43: library part CMP-001-00056-2, "Chip Capacitor, 2,2µF +/-20%, 10V, 0402, Thickness 0.6 mm", Case/Package=0603, Max Operating Temperature=85°C, Min Operating Temperature=-55°C, Tolerance=10%, Voltage Rating=10V, Mounting Technology=SMT, Pins=2
C24 C25 C26 C27: library part CMP-001-00054-2, "Chip Capacitor, 100µF +/-20%, 6.3V, 0805, Thickness 1.45 mm", Case/Package=0402, Max Operating Temperature=85°C, Min Operating Temperature=-55°C, Tolerance=10%, Voltage Rating=6.3V, Mounting Technology=SMT, Pins=2
C40 C41: library part CMP-001-00072-2, "Chip Capacitor, 12pF +/-10%, 50V, 0402, Thickness 0.33 mm", Case/Package=0603, Max Operating Temperature=85°C, Min Operating Temperature=-55°C, Tolerance=20%, Voltage Rating=50V, Mounting Technology=SMT, Pins=2
CN1 CN2: library part CMP-002-00058-1, "Receptacle Connector, 50 V, 0.3 A, -45 to 125 degC, RoHS, Tape and Reel", Pins=52, System=Connector
CN3: library part CMP-002-00059-1, "Receptacle Connector, 30 V, 0.3 A, -35 to 85 degC, RoHS, Tape and Reel", Connector Type=Receptacle,CenterStripContacts, Pins=20, System=Connector
CN4: library part CMP-002-00060-1, "Male Header, Pitch 1 mm, 1 x 6 Position, Height 2.95 mm, -25 to 85 degC, RoHS, Tape and Reel", Case/Package="Male Header, Pitch 1 mm, 1 X 6 Position, Height 2.9 mm", Mounting Technology=SurfaceMount, Pins=8
D1: library part CMP-004-00022-2, "Switching Diode (High Speed Switching), 80 V, 100 mA, 2-Pin SOD-923, RoHS, Tape and Reel", Mounting Technology=SMT, Pins=2
L1: library part CMP-006-00020-1, "Inductor for Power Circuit, 2.2 uH, +/- 20%, -40 to 105 degC, 2-Pin SMD, RoHS, Tape and Reel", Tolerance=20%, Mounting Technology=SurfaceMount, Pins=2
PTH1 PTH2: library part CMP-00028-00004-1, "M2 PTH (2.5mm), 5mm pad", Pins=1
R1: library part CMP-009-00148-2, Case/Package=0402, Max Operating Temperature=155°C, Min Operating Temperature=-55°C, Pins=2
R2: library part CMP-009-00126-2, "Chip Resistor, 383 kOhms, +/-1 %, 63 mW, -55 to 155 degC, 0402", Case/Package=0402, Max Operating Temperature=155°C, Min Operating Temperature=-55°C, Power=63mW, Tolerance=1%, Pins=2
R3 R9 R14 R18: library part CMP-009-00157-2, "Chip Resistor, 1 kOhms, +/-5 %, 63 mW, -55 to 155 degC, 0402", Case/Package=0402, Max Operating Temperature=155°C, Min Operating Temperature=-55°C, Power=63mW, Tolerance=5%, Pins=2
R4: library part CMP-009-00130-2, "Chip Resistor, 84,5 kOhms, +/-1 %, 63 mW, -55 to 155 degC, 0402", Case/Package=0402, Max Operating Temperature=155°C, Min Operating Temperature=-55°C, Power=63mW, Tolerance=1%, Pins=2
R5 R6: library part CMP-009-00166-2, "Chip Resistor, 2,2 kOhms, +/-5 %, 63 mW, -55 to 155 degC, 0402", Case/Package=0402, Max Operating Temperature=155°C, Min Operating Temperature=-55°C, Power=63mW, Tolerance=5%, Pins=2
R7 R8 R11 R16: library part CMP-009-00161-2, "Chip Resistor, 200 Ohms, +/-5 %, 63 mW, -55 to 155 degC, 0402", Case/Package=0402, Max Operating Temperature=155°C, Min Operating Temperature=-55°C, Power=63mW, Tolerance=5%, Pins=2
R10 R15 R17 R27: library part CMP-009-00151-2, "Chip Resistor, 1 MOhms, +/-5 %, 63 mW, -55 to 155 degC, 0402", Case/Package=0402, Max Operating Temperature=155°C, Min Operating Temperature=-55°C, Power=63mW, Tolerance=5%, Pins=2
R12 R13: library part CMP-009-00176-2, "Chip Resistor, 120 Ohms, +/-5 %, 0.1 W, -55 to 155 degC, 0603", Case/Package=0603, Max Operating Temperature=155°C, Min Operating Temperature=-55°C, Power=100mW, Tolerance=5%, Pins=2
R19 R21 R22 R24 R26 R28 R29: library part CMP-009-00149-2, "Chip Resistor, 10 kOhms, +/-1 %, 63 mW, -55 to 125 degC, 0402", Case/Package=0402, Max Operating Temperature=155°C, Min Operating Temperature=-55°C, Power=63mW, Tolerance=1%, Pins=2
R20: library part CMP-009-00167-2, "Chip Resistor, 100 Ohms, +/-1 %, 63 mW, -55 to 155 degC, 0402", Case/Package=0402, Max Operating Temperature=155°C, Min Operating Temperature=-55°C, Power=63mW, Tolerance=1%, Pins=2
R23 R25 R30: library part CMP-009-00158-2, "Chip Resistor, 4,7 kOhms, +/-1 %, 63 mW, -55 to 155 degC, 0402", Case/Package=0402, Max Operating Temperature=155°C, Min Operating Temperature=-55°C, Power=63mW, Tolerance=1%, Pins=2
RJ1: library part CMP-009-00116-1, Max Operating Temperature=155°C, Min Operating Temperature=-55°C, Pins=2
RN1 RN2 RN3 RN4 RN5 RN6: library part CMP-009-00117-2, "Res Thick Film Array 200 Ohm 5% 200ppm/C ISOL Molded 8-Pin 0804(4 X 0402) Convex SMD Punched Carrier T/R", Case/Package=0402, Max Operating Temperature=125°C, Min Operating Temperature=-55°C, Power=62.5mW, Tolerance=5%, Pins=8
U1: library part CMP-019-00038-1, "Step Down Converter, 3 MHz, 1.6 A, -45 to 85 degC, 8-Pin WSON, RoHS, Tape and Reel", Pins=9
U2: library part CMP-019-00040-1, "Ultra-Low-Noise, Low-IQ LDO, 3.3 V, 0.25 A, -40 to 125 degC, 4-Pin X2SON, RoHS, Tape and Reel", Max Operating Temperature=125°C, Min Operating Temperature=-40°C, Output Voltage=3.3V, Pins=5
U3: library part CMP-019-00034-1, "REEL / F-RAM Memory Serial", Case/Package=DFN, Max Operating Temperature=85°C, Min Operating Temperature=-40°C, Memory Format=FRAM,RAM, Pins=8, Speed=40MHz
U4 U5 U6: library part CMP-015-00004-1, "Bidirectional Voltage-Level Translator with Auto-Direction Sensing and +/-15 KV ESD Protection, 8 Bit, -40 to 85 degC, 20-Pin USON (DQS), Green (RoHS & no Sb/Br), Tape and Reel", Pins=20
U7: library part CMP-015-00002-1, "IC TRANSLATOR VOLTAGE 8-X2SON", Max Operating Temperature=85°C, Max Supply Voltage=5.5V, Min Operating Temperature=-40°C, Min Supply Voltage=1.65V, Pins=8
U8 U10: library part CMP-014-00000-1, "Rail-to-rail Input / Output GBP Operational Amplifier, 20 MHz, -40 to 125 degC, 6-Pin DFN, RoHS, Tape and Reel", Max Operating Temperature=125°C, Min Operating Temperature=-40°C, Channels=2, Pins=6
U9: library part CMP-015-00005-1, "Dual High-speed CAN Transceiver with Standby Mode, 4.75 to 5.25 V, 14-Pin HVSON, RoHS, Tape and Reel", Pins=15
U11: library part CMP-031-00001-1, "CONFIGURABLE MULTIPLE-FUNCTION GATE, DRY0006A, LARGE T&R", Pins=6
U12: library part CMP-020-00021-1, "ARM Cortex-M4 32-bit MCU+FPU, 2048 KB Flash, 256 KB Internal RAM, 82 I/Os, 100-Pin LQFP, -40 to 85 degC, Tape and Reel", Min Supply Voltage=1.7V, ComponentLink1Description="Manufacturer URL", ComponentLink1URL=http://www.st.com/, ComponentLink2Description=Datasheet, ComponentLink2URL=http://www.st.com/st-web-ui/static/active/en/resource/technical/document/datasheet/DM00071990.pdf, Mounting Technology="Surface Mount", Pins=100, RAM Size=256
Y1: library part CMP-003-00028-1, "Crystal, 24 MHz, +/- 10 ppm, -20 to 75 degC, 4-Pin SMD, RoHS, Tape and Reel", Case/Package=SMD/SMT, Frequency=24MHz, Load Capacitance=12pF, Max Operating Temperature=75°C, Min Operating Temperature=-20°C, ESR=80, Mounting Technology=SMT, Pins=4, RoHS Compliant=Yes

## Via types
v1: diameter 0.4, hole 0.2, Top to Bottom, tented both sides, 375 vias
v2: diameter 0.4, hole 0.2, Top to Bottom, 11 vias

## Nets (pads, with @x,y where several pads share a name; then routed paths per layer and width w, separated by ;. In a path a pad name is that pad's centre, name@x,y a point inside that pad or via, vN(x,y) a via of type N, cw(c..) or ccw(c..) an arc to the next point about the centre after c; other vN are vias at no path point)
-LED_B: CN1.23 U12.89 | length 30.2
  Top w0.15: U12.89@-7.75,-0.5 -7.052,-0.5 -6.917,-0.365 -5.421,-0.365 v1(-5.344,-0.288) ; v1(5.194,-0.9) 5.194,4.882 5.834,5.521 5.834,5.934 6.85,6.95 6.85,12.1 v1(6.75,12.2)
  L3 w0.15: v1(-5.344,-0.288) -4.917,0.139 -2.761,0.139 -1.9,1 -0.85,1 -0.15,0.3 1.6,0.3 2.467,-0.567 2.467,-1.117 2.8,-1.45 3.163,-1.45 3.712,-0.9 v1(5.194,-0.9)
  Bottom w0.15: v1@6.75,12.25 CN1.23@6.75,13.5
-LED_G: CN1.21 U12.36 | length 16.9
  Top w0.15: 7.15,10.75 7.15,6.85 6.15,5.85 6.15,5.415 5.45,4.715 5.45,1.5 6.02,0.93 6.5,0.93 6.9,0.53 6.9,-0.798 7.102,-1 U12.36@7.75,-1
  Top w0.152: 7.15,10.75 7.15,12.007 7.214,12.071 7.214,12.414 v1@7.25,12.45
  Bottom w0.152: v1@7.2,12.55 v1(7.25,12.5) ; v1@7.25,12.45 v1(7.25,12.5) ; CN1.21@7.25,13.5 v1(7.25,12.5)
-LED_R: CN1.19 U12.48 | length 9.8
  Top w0.15: 7.45,11.55 7.45,6.75 6.75,6.05 6.75,5.3 7.047,5.003 7.747,5.003 U12.48@7.75,5
  Top w0.152: 7.45,11.55 7.45,11.95 7.701,12.201 7.702,12.2 v1(7.75,12.2)
  Bottom w0.152: v1(7.75,12.2) 7.75,12.25 CN1.19@7.75,13.5
BAT_CURRENT: R16.2 U10.1 U10.4 U12.26 | length 10.4
  Top w0.15: U12.26@7.75,-6 8.85,-6 ; 8.851,-6 v1(9.1,-6)
  L3 w0.15: v1(9.1,-6) 9.35,-6.25 12.05,-6.25 v1(12.5,-6.7)
  L4 w0.15: v1(11.1,-8.55) 11.1,-8.1 v1(12.5,-6.7)
  Bottom w0.15: R16.2@9.605,-9.4 9.605,-9.375 10.275,-9.375 v1(11.1,-8.55) 11.115,-8.535 U10.1@11.115,-8 ; U10.4@12.5,-7.185 v1(12.5,-6.7)
BAT_CURRENT_MB: CN1.28 R14.2 R16.1 | length 21.9
  Bottom w0.15: CN1.28@5.75,9.8 5.696,9.746 5.696,9.096 5.551,8.951 5.551,6.416 5.733,6.235 5.733,5.346 5.2,4.813 5.2,3.033 5.41,2.823 5.41,0.288 8.1,-2.402 v1(8.1,-8.8) 8.695,-8.8 ; R16.1@8.695,-9.4 8.695,-8.8 ; R14.2@8.695,-8.3 8.695,-8.8
BAT_CURRENT_MB_R: R14.1 R15.2 U10.2 | length 2.7
  Bottom w0.15: R14.1@9.605,-8.3 9.605,-7.7 ; R15.2@9.605,-7.2 9.605,-7.7 ; U10.2@11.115,-7.6 10.305,-7.6 10.205,-7.7 9.605,-7.7
BAT_VOLTAGE: R11.2 U8.1 U8.4 U12.25 | length 10.9
  Top w0.15: U12.25@6,-7.75 v1@6.55,-7.75 ; R11.2@9.605,-7.2 U8.1@11.115,-7.2 ; U8.4@12.485,-8 13.2,-8 13.41,-8.21 13.4,-8.219 v1(13.4,-8.25)
  L3 w0.15: v1(6.55,-7.725) 6.855,-7.725 7.107,-7.977 8.236,-7.977 9.116,-7.098 11.668,-7.098 12.82,-8.25 v1(13.4,-8.25)
  other v1: 10.2,-7.05
BAT_VOLTAGE_MB: CN1.30 R9.2 R11.1 | length 21
  Top w0.15: v1(7.65,-7.3) 8.595,-7.3 8.695,-7.2 R9.2@8.695,-8.3
  Bottom w0.15: CN1.30@5.25,10 5.25,6.333 5.45,6.133 5.45,5.473 4.947,4.97 4.947,2.8 4.966,2.8 5.15,2.616 5.15,0.161 7.775,-2.464 7.775,-7.175 v1(7.65,-7.3)
BAT_VOLTAGE_MB_R: R9.1 R10.2 U8.2 | length 3
  Top w0.15: R10.2@9.605,-9.45 9.605,-8.3 9.605,-8.145 10.15,-7.6 U8.2@11.115,-7.6
BOOT: CN2.23 R29.2 U12.94 | length 7.7
  Top w0.15: v1(-12.5,-5.75) -10.6,-5.75 -10.6,-4.91 -8.69,-3 U12.94@-7.75,-3
  Bottom w0.15: CN2.23@-13.8,-5.75 v1(-12.5,-5.75)
BOOT1: R28.2 U12.37 | length 1.7
  Top w0.15: U12.37@7.75,-0.5 7.8,-0.55 7.85,-0.5 v1(8.75,-0.5)
  Bottom w0.15: R28.2@8.155,-0.5 8.205,-0.55 8.255,-0.5 v1(8.75,-0.5)
BPWR_ON: CN2.37 U12.34 | length 25.8
  Top w0.15: v1(6.7,-2) U12.34@7.75,-2
  L4 w0.15: v1(-12.3,-9.25) -12.3,-9.254 -12.404,-9.15 -5.268,-9.15 -3.918,-7.8 2.65,-7.8 5.917,-4.533 5.917,-3.583 6.7,-2.8 v1(6.7,-2)
  Bottom w0.15: CN2.37@-13.767,-9.25 v1(-12.3,-9.25)
BUZZ: CN2.33 U12.77 | length 19.3
  Top w0.15: U12.77@-7.75,5.5 v1(-6.7,5.5)
  L3 w0.15: v1(-12.3,-8.25) -10.93,-8.25 -10.3,-7.62 -10.3,-2.278 -8.1,-0.078 -8.1,3.103 -7.6,3.603 -7.6,4.7 -6.8,5.5 v1(-6.7,5.5)
  Bottom w0.15: CN2.33@-13.6,-8.25 v1(-12.3,-8.25)
CAN1_DN: CN1.36 R12.1 U9.12 | length 4.1
  Bottom w0.15: U9.12@3.15,5.97 R12.1@3.15,7.5 3.15,7.614 3.75,8.214 CN1.36@3.75,9.8
CAN1_DP: CN1.34 R12.2 U9.13 | length 4.3
  Bottom w0.15: U9.13@3.8,5.97 3.8,6.7 4.55,7.45 R12.2@4.55,7.5 4.25,7.8 CN1.34@4.25,9.8
CAN1_RX: U9.4 U12.81 | length 11.7
  Top w0.15: U12.81@-7.75,3.5 v1@-6.705,3.5
  L3 w0.15: v1(-6.605,3.5) -6.155,3.05 -3.575,3.05 -3.5,3.125 2.112,3.125 2.5,2.736 v1(2.5,2.4)
  Bottom w0.15: v1(2.5,2.4) 2.5,3.22 2.495,3.225 U9.4@2.5,3.23
CAN1_TX: U9.1 U12.82 | length 13.8
  Top w0.15: U12.82@-7.75,3 -6.85,3 -6.5,3 v1(-6,3.5)
  L3 w0.15: v1(-6,3.5) -5.846,3.346 -3.684,3.346 -3.58,3.45 3.406,3.45 v1(4.451,2.405)
  Bottom w0.15: v1(4.451,2.405) U9.1@4.451,3.229
CAN2_DN: CN1.48 R13.1 U9.9 | length 4.3
  Bottom w0.15: R13.1@0.45,7.45 R13.1@0.45,7.5 0.6,7.65 0.6,7.755 0.75,7.905 CN1.48@0.75,9.8
  Bottom w0.2: R13.1@0.45,7.45 1.2,6.7 U9.9@1.2,5.97
CAN2_DP: CN1.46 R13.2 U9.10 | length 4.2
  Bottom w0.15: CN1.46@1.25,9.8 1.25,9.098 1.056,8.904 1.056,8.294 R13.2@1.85,7.5
  Bottom w0.2: U9.10@1.85,5.97 R13.2@1.85,7.5
CAN2_RX: U9.8 U12.51 | length 10.7
  Top w0.15: v1@5.15,5.9 5.15,6.15 6,7 U12.51@6,7.75
  L3 w0.15: v1(-1.4,5.95) 3.959,5.95 4.109,5.8 v1(5.05,5.8)
  Bottom w0.15: v1(-1.4,5.95) 0.48,5.95 U9.8@0.55,6.02
CAN2_TX: U9.5 U12.52 | length 8.2
  Top w0.15: v1(1.849,2.4) 2.699,3.25 3.813,3.25 4.548,3.985 4.548,5.998 5.5,6.95 U12.52@5.5,7.75
  Bottom w0.15: v1@1.85,2.5 U9.5@1.85,3.23
ESC_M1: U4.3 U12.45 | length 4.2
  Top w0.15: U12.45@7.75,3.5 9.15,3.5 9.7,2.95 v1(9.7,2.349)
  Bottom w0.15: U4.3@9.6,3.7 9.6,3 9.7,2.9 v1(9.7,2.349)
ESC_M2: U4.4 U12.44 | length 2.4
  Top w0.15: U12.44@7.75,3 8.987,3 9.187,2.8 v1(9.2,2.8)
  Bottom w0.15: v1(9.2,2.8) U4.4@9.2,3.7
ESC_M3: U4.7 U12.42 | length 3.9
  Top w0.152: v1(6.625,1.85) 6.775,2 U12.42@7.75,2
  Bottom w0.15: v1(6.625,1.85) 7.05,1.85 8,2.8 U4.7@8,3.7
ESC_M4: U4.8 U12.40 | length 4.9
  Top w0.15: v1(6.2,1.364) 6.553,1.364 6.917,1 U12.40@7.75,1
  Bottom w0.15: v1(6.2,1.364) 6.2,2.067 6.633,2.5 7.2,2.5 7.6,2.9 U4.8@7.6,3.7
ESC_M5: U4.9 U12.60 | length 11.4
  Top w0.15: U12.60@1.5,7.75 1.5,8.498 v1(1.5,8.618)
  L3 w0.152: v1(1.5,8.618) 2.918,7.2 4.663,7.2 5.811,6.053 5.811,3.411 5.833,3.388 v1@5.895,3.45 ; v1(5.85,3.45) v1@5.895,3.45 ; v1@5.906,3.461 v1@5.895,3.45
  Bottom w0.152: v1(5.85,3.45) 6.45,2.85 7,2.85 7.2,3.05 U4.9@7.2,3.7
ESC_M6: U4.10 U12.61 | length 13.9
  Top w0.15: U12.61@1,7.75 1,8.649 3.597,11.245 3.7,11.245 v1(3.748,11.293)
  L4 w0.15: v1(3.748,11.293) 5.2,9.841 5.2,7.8 5.893,7.107 5.893,4.759 6.152,4.5 v1(6.35,4.5)
  Bottom w0.15: v1(6.35,4.5) 6.647,4.5 6.8,4.347 6.8,3.775 U4.10@6.8,3.7
EXT_SPI_CS#: CN2.49 U12.43 | length 34
  Top w0.15: v1(-12.3,-12.25) v1@-12.19,-12.25 ; U12.43@7.75,2.5 v1@8.75,2.5
  L4 w0.15: v1@-12.3,-12.3 -2.95,-12.3 -1.95,-11.3 2.526,-11.3 4.35,-9.476 4.35,-8.636 7.6,-5.386 7.6,0.489 8.3,1.189 8.3,2 v1(8.75,2.45)
  Bottom w0.15: CN2.49@-13.6,-12.25 v1(-12.3,-12.25)
EXT_SPI_MISO: CN2.45 U12.4 | length 11.2
  Top w0.15: v1(-12.3,-11.25) -10.832,-11.25 -9.482,-9.9 -5.9,-9.9 -4.516,-8.516 -4.516,-7.766 U12.4@-4.5,-7.75
  Bottom w0.15: CN2.45@-13.8,-11.25 -12.4,-11.25 v1(-12.3,-11.25)
EXT_SPI_MOSI: CN2.47 U12.5 | length 11.9
  Top w0.15: v1(-12.5,-11.75) -12.375,-11.625 -10.775,-11.625 -9.374,-10.224 -5.737,-10.224 -4,-8.487 U12.5@-4,-7.75
  Bottom w0.15: CN2.47@-13.8,-11.75 CN2.47@-13.6,-11.75 v1(-12.5,-11.75)
EXT_SPI_SCK: CN2.43 U12.1 | length 9.7
  Top w0.15: v1(-12.5,-10.75) -12.4,-10.85 -10.8,-10.85 -9.55,-9.6 -6.448,-9.6 -6,-9.152 U12.1@-6,-7.75
  Bottom w0.15: CN2.43@-13.6,-10.75 v1(-12.5,-10.75)
FMU_AREF: C36.2 R20.2 U12.21 | length 4.3
  Top w0.15: U12.21@4,-7.75 4,-8.6 4.2,-8.8 C36.2@4.2,-10.45 4.422,-10.672 4.617,-10.672 5.1,-11.155 5.1,-11.18 5.275,-11.355 R20.2@5.3,-11.355
FMU_RC_INPUT: U11.4 U12.64 | length 16.5
  Top w0.15: U12.64@-0.5,7.75 -0.5,7 -0.653,6.847 -1.138,6.847 -1.927,6.058 -1.927,0.847 -2.212,0.563 -2.212,-0.553 -0.865,-1.9 0.109,-1.9 0.659,-2.45 v1(3.85,-2.45)
  Bottom w0.15: U11.4@3.45,-2.45 v1(3.85,-2.45)
FMU_VBAT: C24.2 C25.2 C26.2 C27.2 R18.1 U12.6 | length 14.6
  Top w0.15: v1(-3.5,-8.75) U12.6@-3.5,-7.75
  L3 w0.15: v1(-3.5,-8.75) -3.5,-9.5 -0.3,-12.7 -0.3,-12.95 v1(-0.25,-13)
  Bottom w0.15: 0,-13 0.695,-13 0.7,-13.005 0.96,-13.005 2.165,-11.8 C27.2@2.36,-11.8 ; C25.2@4.7,-11.8 C25.2@4.7,-11.71
  Bottom w0.3: C27.2@2.45,-11.71 C26.2@2.45,-10.29 C24.2@4.7,-10.29 C25.2@4.7,-11.71
FMU_XTAL_IN: C41.1 U12.12 Y1.1 | length 5.1
  Top w0.15: Y1.1@-0.9,-11.45 -1.05,-11.45 -1.903,-10.597 -2.053,-10.597 C41.1@-2.2,-10.45 -0.5,-8.75 U12.12@-0.5,-7.75
FMU_XTAL_OUT: C40.1 U12.13 Y1.3 | length 4.2
  Top w0.15: U12.13@0,-7.75 0,-8.5 0.65,-9.15 0.65,-10.35 Y1.3@0.5,-10.35 ; Y1.3@0.7,-10.35 1.7,-10.35 C40.1@1.8,-10.45